# Altium PCB EthereCAT_to_CAN.PcbDoc (part 1 of 3)
Units mil, origin at the board's own origin, x right, y up, seen from the top; angles counter-clockwise.
Board outline 2515.04 x 1574.83 mil, 4 copper layers (Top Layer, L2-G, L3-V, Bottom Layer), stack 23.756 mil thick; 178 components, 102 nets, 583 pads, 389 vias.
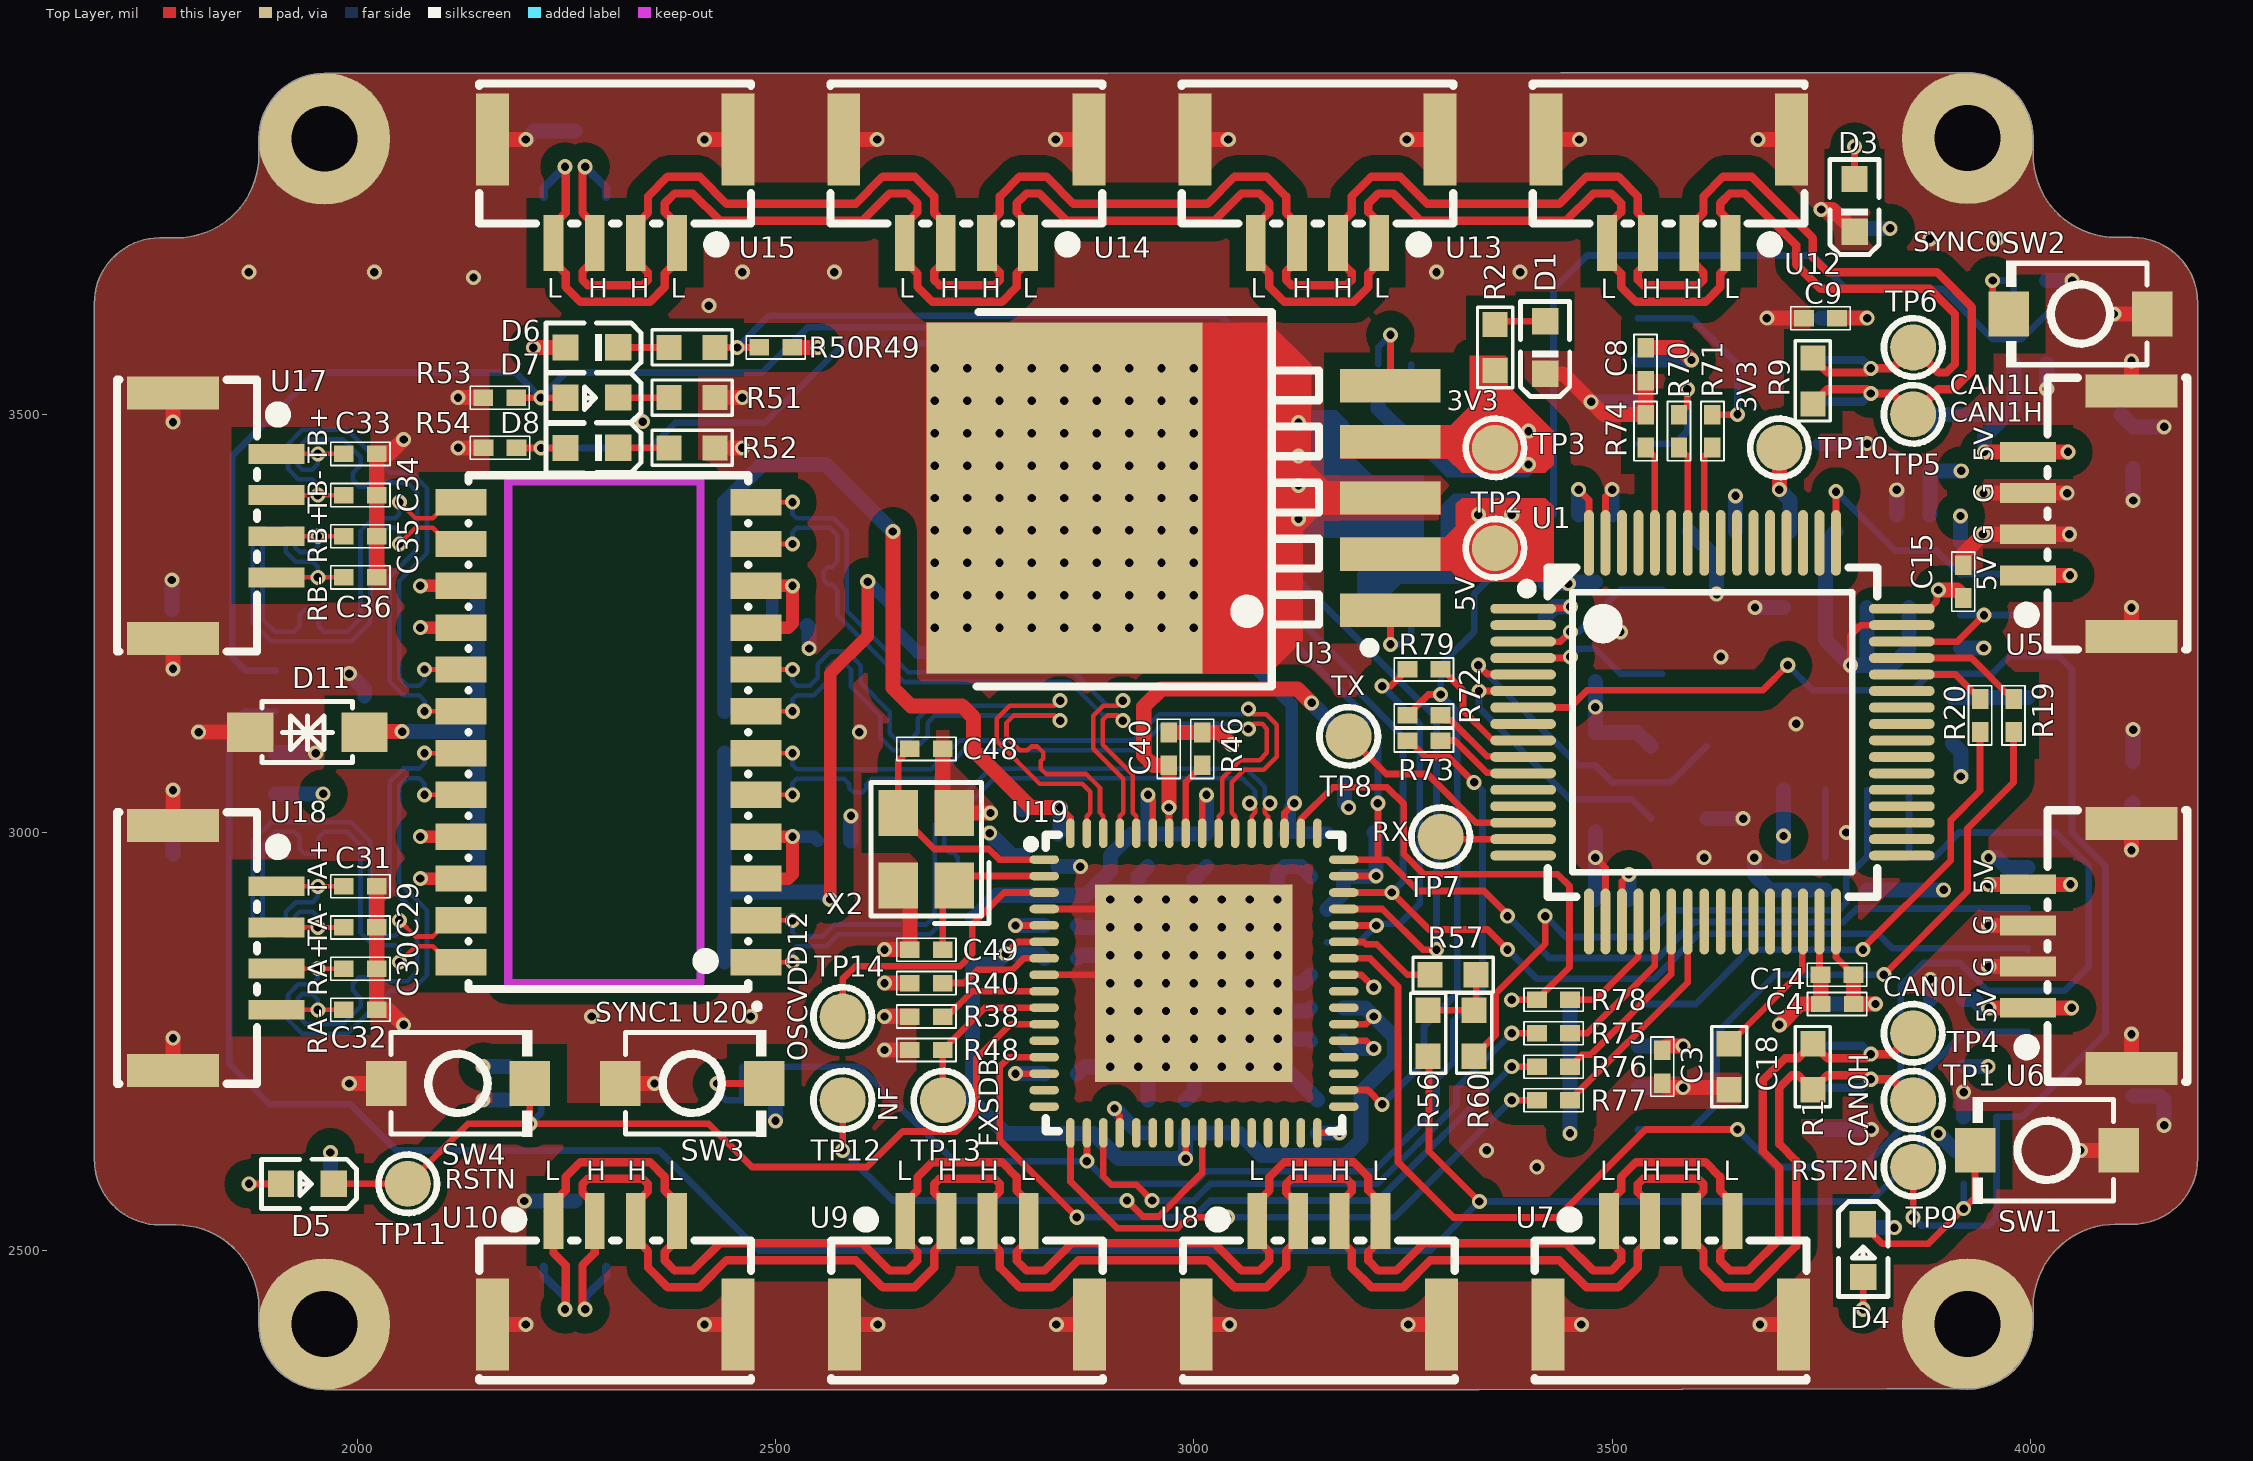
[diagram p0: Top Layer view]
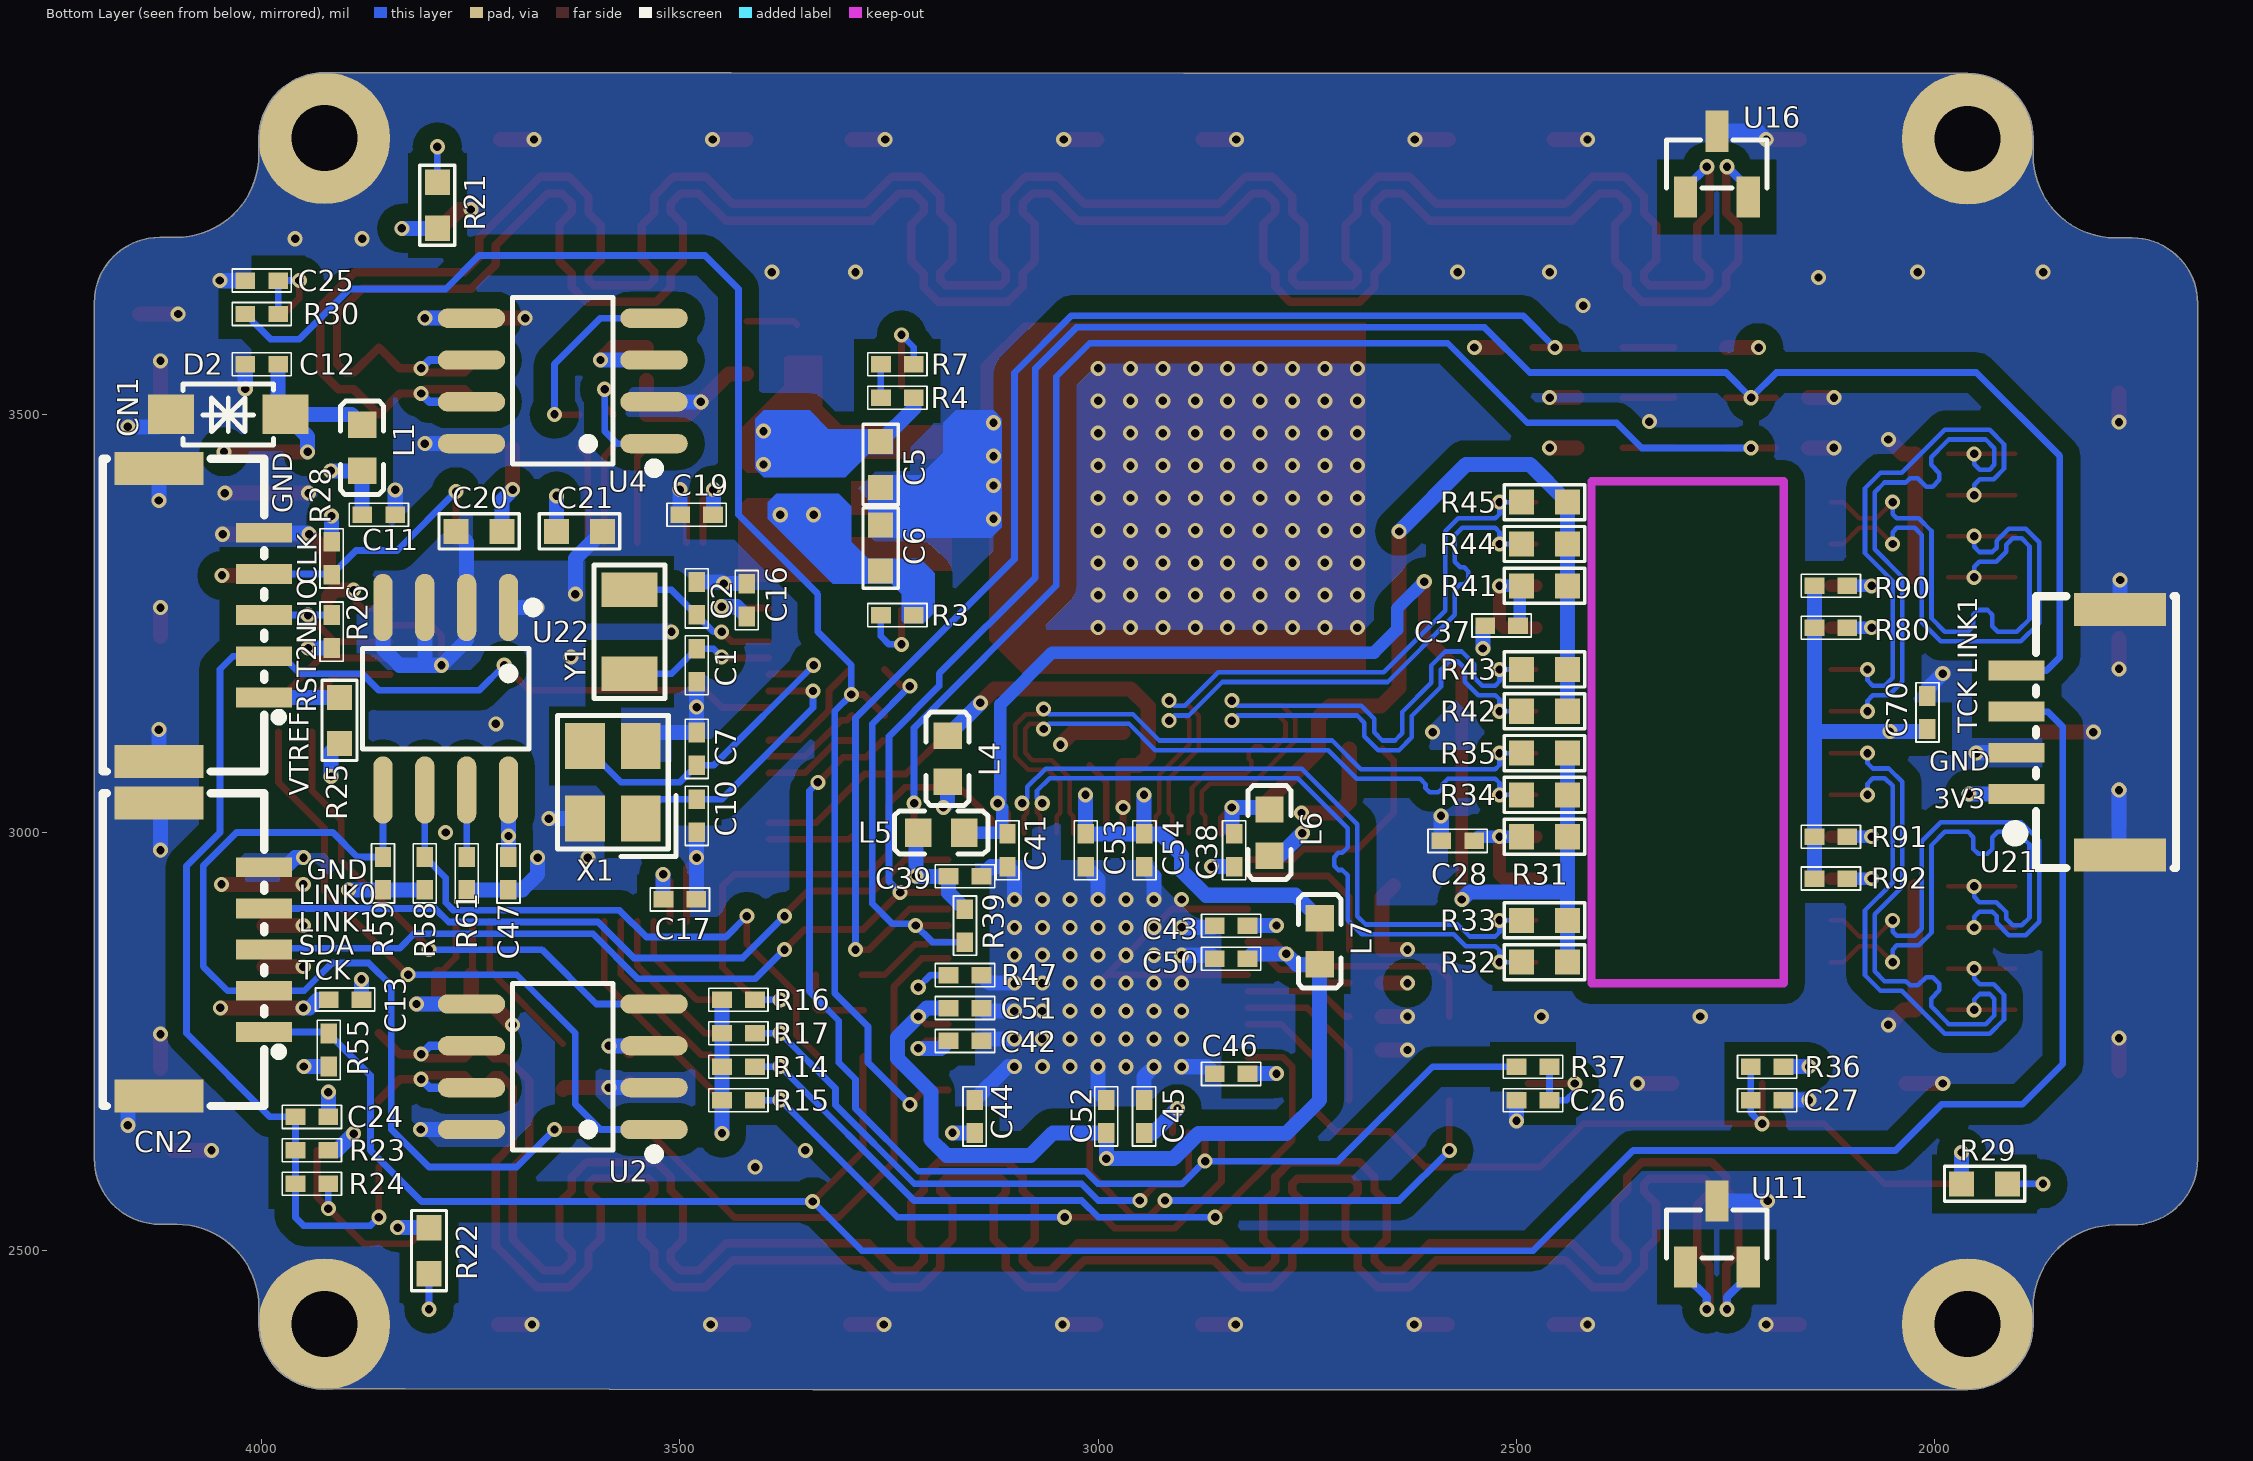
[diagram p1: Bottom Layer view, seen from below]
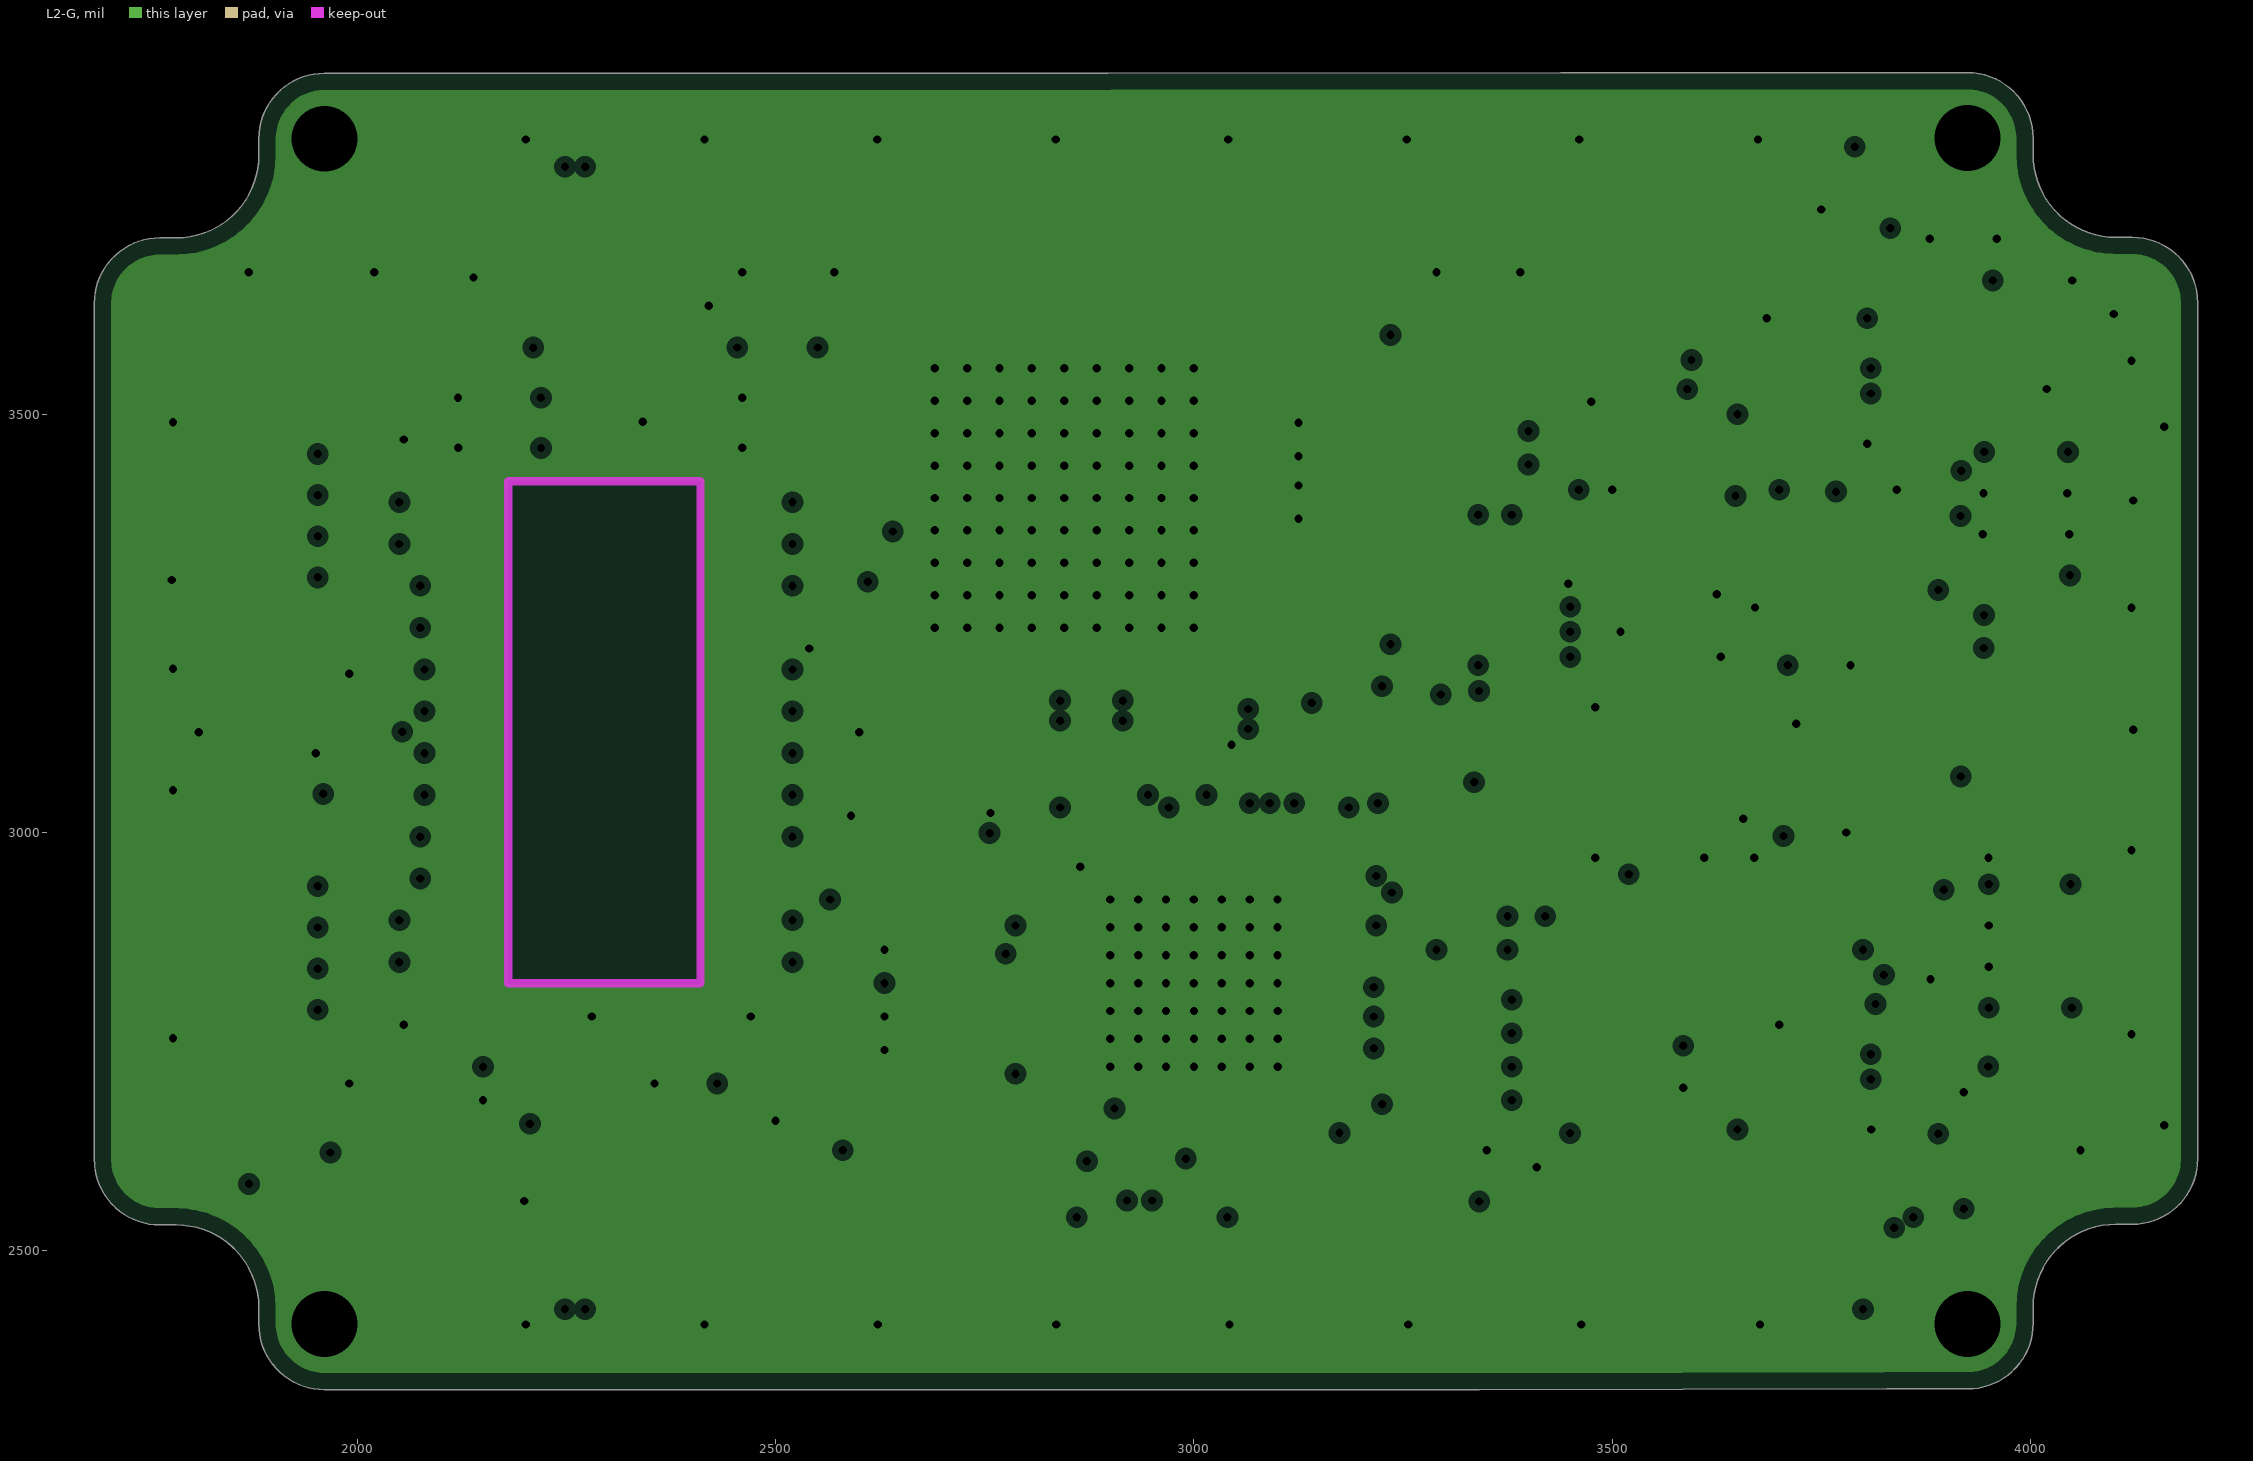
[diagram p2: L2-G, clearances drawn from the general rule]
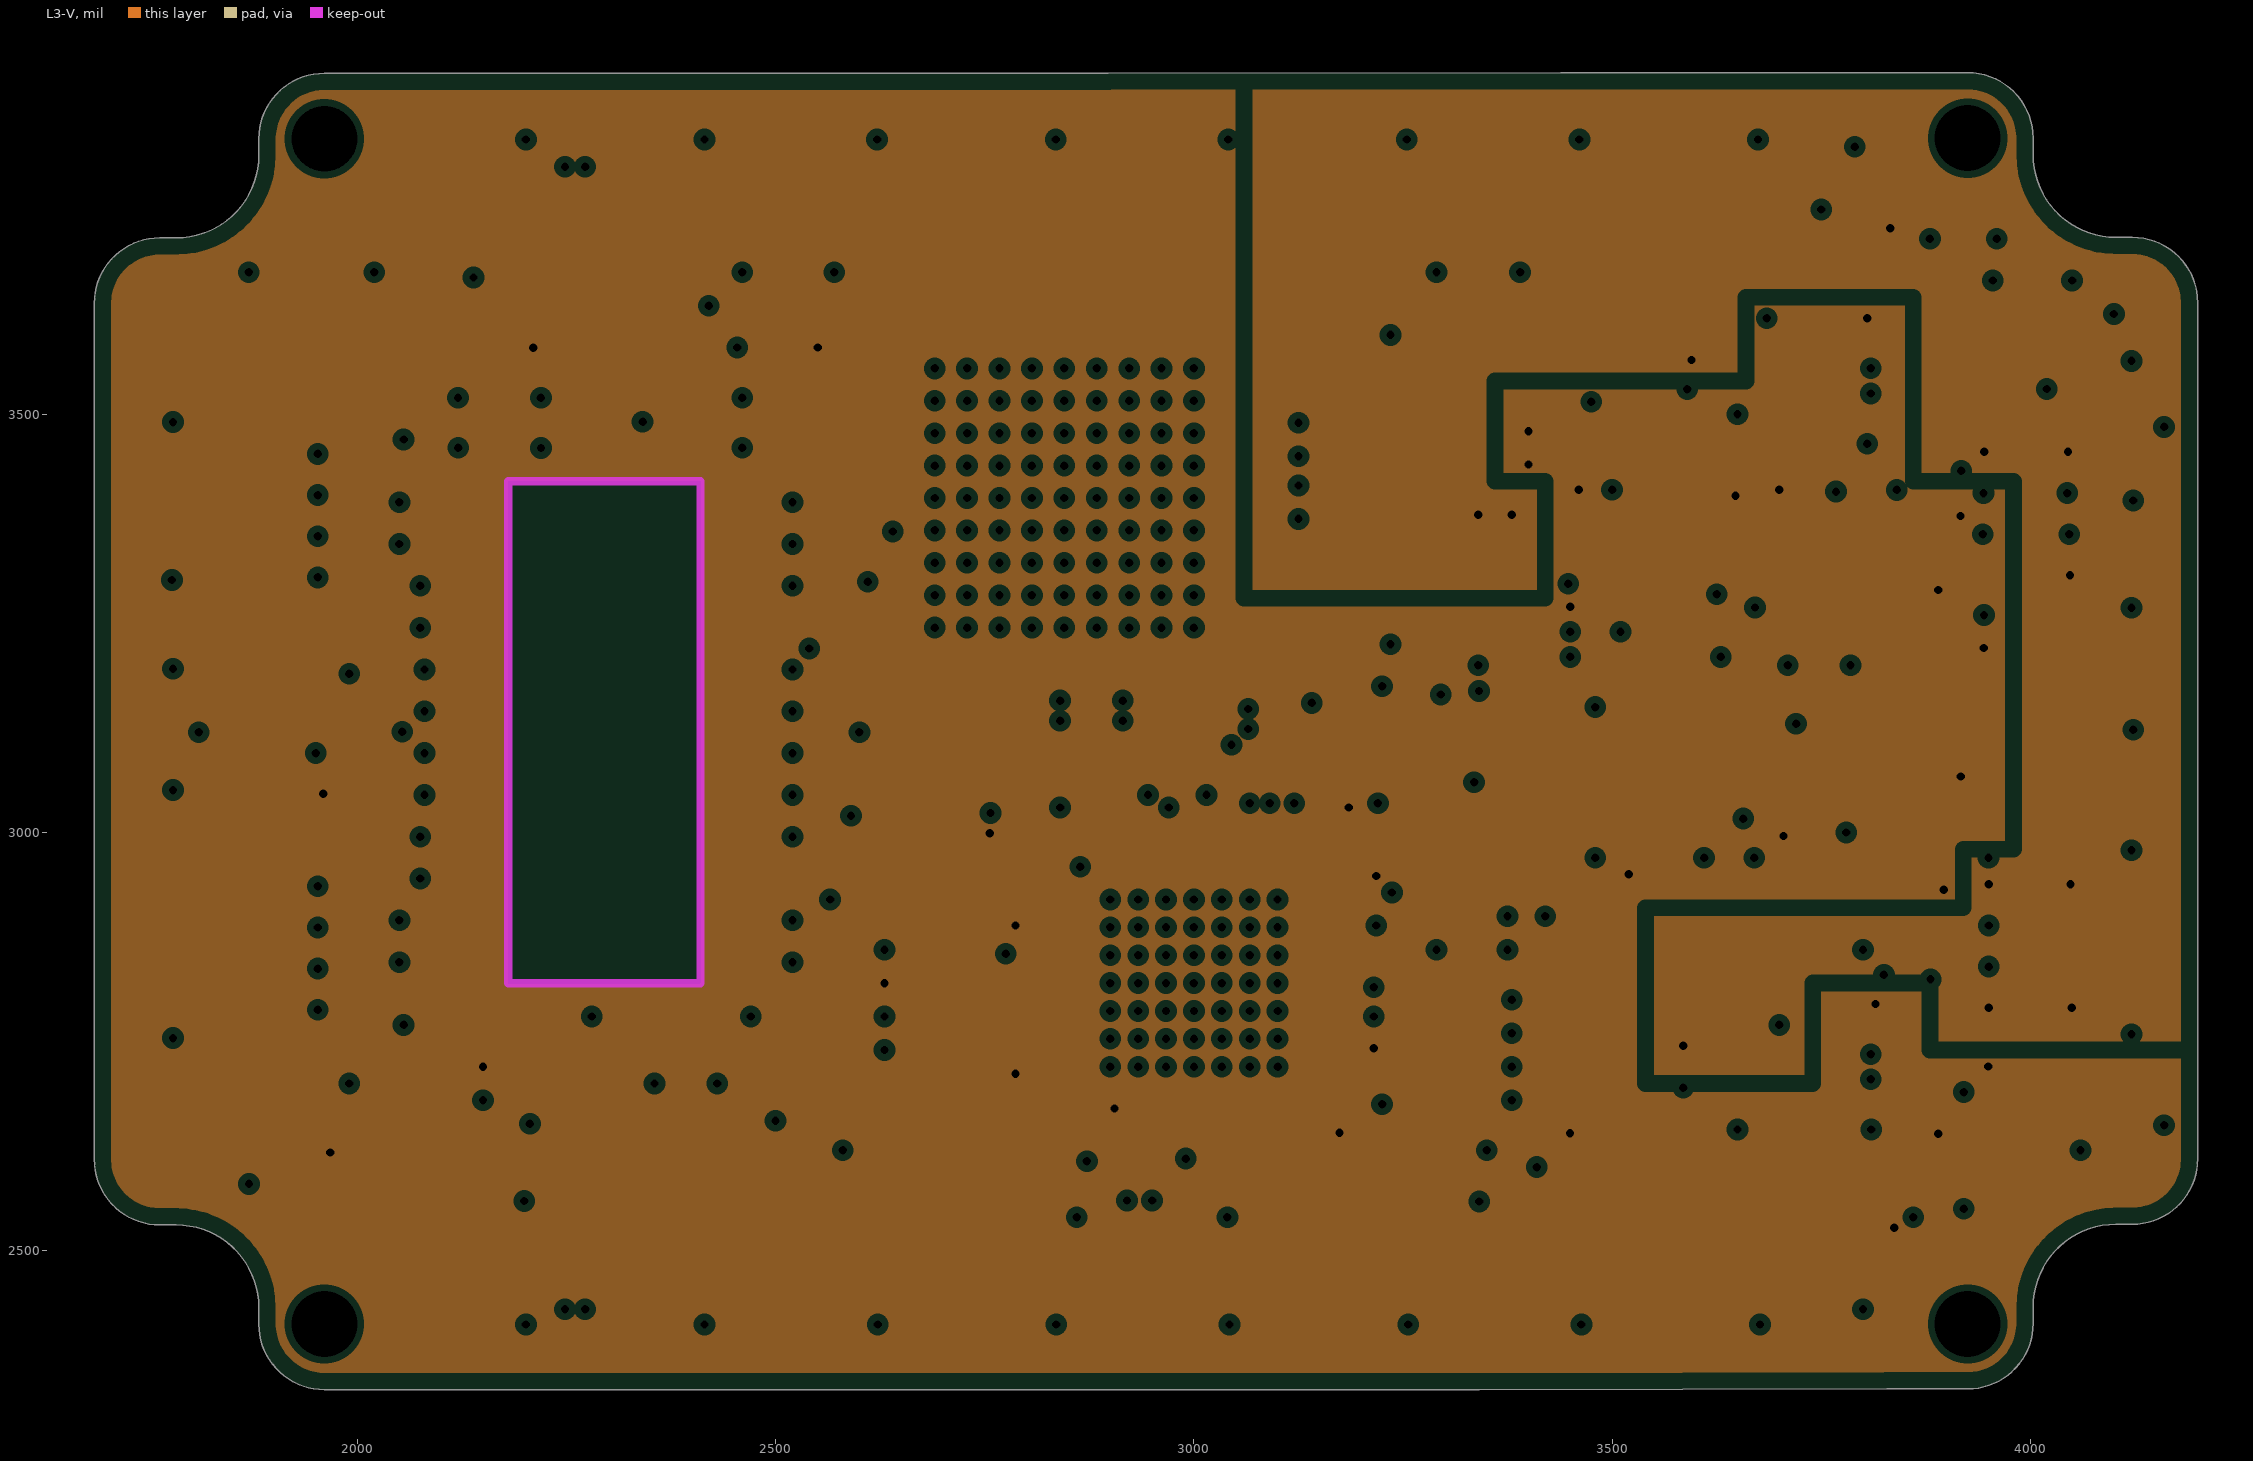
[diagram p3: L3-V, clearances drawn from the general rule]
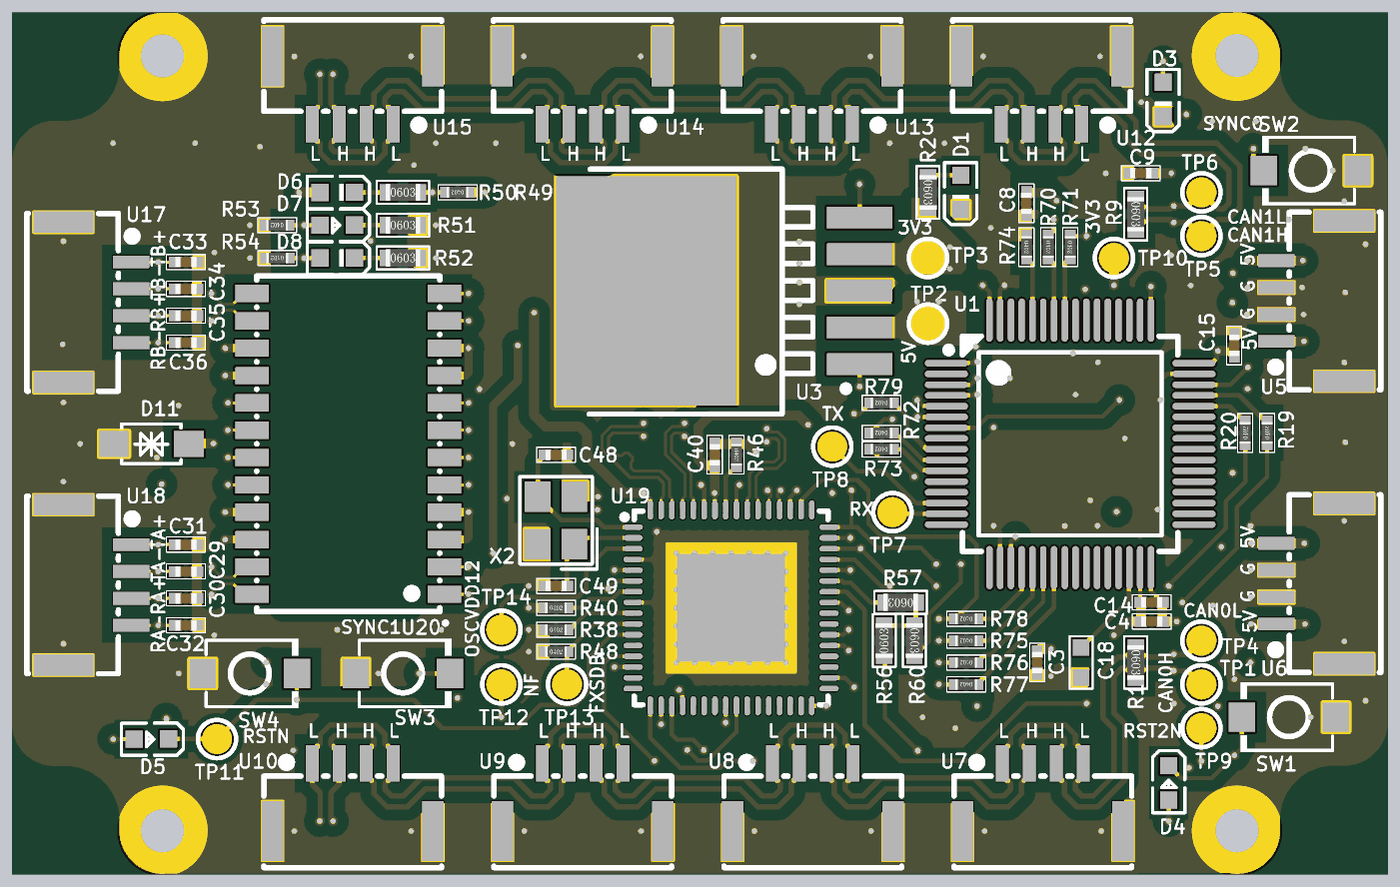
[diagram p5: 3D render of the assembled board from above, using the file's embedded part models]
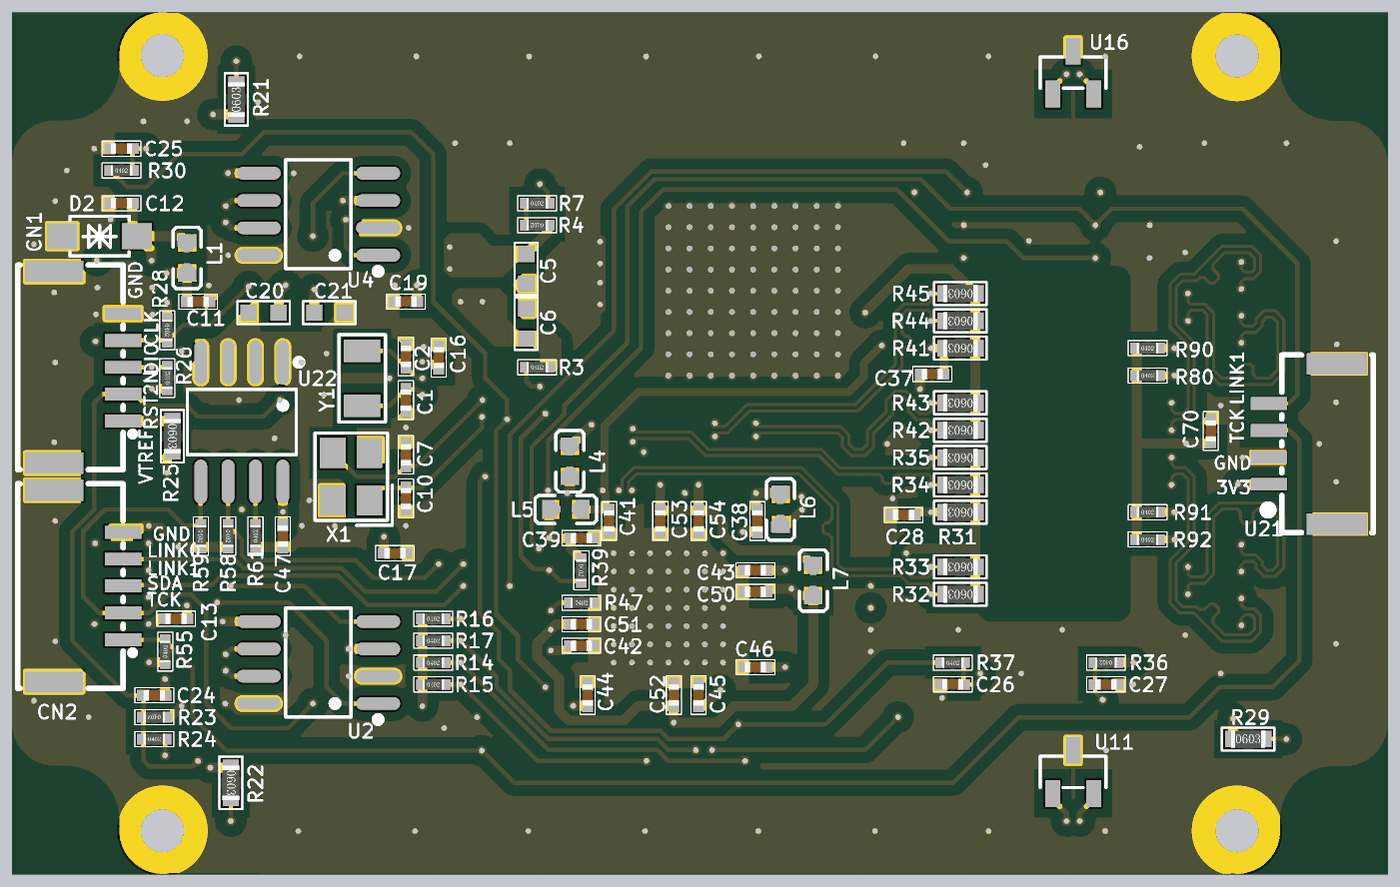
[diagram p6: 3D render of the assembled board from below, using the file's embedded part models]

## Layer stack, top to bottom
Top Solder: solder mask 0.4, Solder Resist, Dk 3.5
Top Layer: signal copper 1.4
Dielectric 2: prepreg 2.8, PP-006, Dk 4.1
L2-G: plane copper 1.378, net GND
Dielectric 1: dielectric 12.6, FR-4, Dk 4.8
L3-V: plane copper 1.378, net 3V3
Dielectric 3: prepreg 2.8, PP-006, Dk 4.1
Bottom Layer: signal copper 1.4
Bottom Solder: solder mask 0.4, Solder Resist, Dk 3.5

## Board outline
1882.02,2412.23 1882.02,2431.92 ccw(c1783.09,2431.92) 1783.09,2530.84 1763.41,2530.84 cw(c1763.41,2609.08) 1685.17,2609.08 1685.17,3632.7 cw(c1763.41,3632.7) 1763.41,3710.94 1783.09,3710.94 ccw(c1783.09,3809.87) 1882.02,3809.87 1882.02,3829.55 cw(c1960.26,3829.55) 1960.26,3907.79 2897.27,3907.79 3438.51,3908.53 3925.12,3908.53 cw(c3925.12,3830.29) 4003.36,3830.29 4003.36,3810.6 ccw(c4102.29,3810.6) 4102.29,3711.68 4121.97,3711.68 cw(c4121.97,3633.44) 4200.21,3633.44 4200.21,2609.82 cw(c4121.97,2609.82) 4121.97,2531.57 4102.29,2531.58 ccw(c4102.29,2432.65) 4003.36,2432.65 4003.36,2412.96 cw(c3925.12,2412.96) 3925.12,2334.72 3828.25,2334.72 3828.27,2334.72 3340.71,2333.7 3340.72,2333.71 2897.72,2333.71 ccw(c2897.27,2333.49) 2897.27,2333.99 1960.26,2333.99 cw(c1960.26,2412.23)

## Design rules (kind name [scope] priority, off if disabled: settings)
AssemblyTestPointUsage [All] p1 off:
AssemblyTestpoint [All] p1 off: testpointundercomponent=TRUE minsize=40 maxsize=100 preferedsize=60 minholesize=0 maxholesize=40 preferedholesize=32 testpointgrid=1 usegrid=TRUE gridtolerance=0.01 allowsidetop=TRUE allowsidebottom=TRUE
Clearance Clearance_4 [InNamedPolygon('1')] p1: gap=20 ignorepadtopadclearanceinfootprint=FALSE
Clearance Clearance_3 [IsKeepOut] p2: gap=1 ignorepadtopadclearanceinfootprint=FALSE except(0: Arc-Hole Track-Hole SMDPad-Hole THPad-Hole Via-Hole Fill-Hole Poly-Hole Region-Hole Text-Hole)
Clearance Clearance_1 [InPolygon] p3: gap=10 ignorepadtopadclearanceinfootprint=FALSE except(0: Arc-Hole Track-Hole SMDPad-Hole THPad-Hole Via-Hole Fill-Hole Poly-Hole Region-Hole Text-Hole)
Clearance Clearance_90 [InDifferentialPairClass('CF90')  or InDifferentialPairClass('CF100')] p4: gap=6 ignorepadtopadclearanceinfootprint=FALSE except(0: Arc-Hole Track-Hole SMDPad-Hole THPad-Hole Via-Hole Fill-Hole Poly-Hole Region-Hole Text-Hole)
Clearance Clearance_2 [HasPad('Free-')] p5: gap=20 ignorepadtopadclearanceinfootprint=FALSE except(0: Arc-Hole Track-Hole SMDPad-Hole THPad-Hole Via-Hole Fill-Hole Poly-Hole Region-Hole Text-Hole)
Clearance [All] p6: gap=6 ignorepadtopadclearanceinfootprint=FALSE except(0: Arc-Hole Track-Hole SMDPad-Hole THPad-Hole Via-Hole Fill-Hole Poly-Hole Region-Hole Text-Hole)
ComponentClearance [All] p1 off: gap=10 collisioncheckmode=3 verticalgap=10 showdistances=FALSE
DiffPairsRouting DiffPairsRouting_120 [InDifferentialPairClass('120')] p1: maxlimit=10 minlimit=10 mostfreqgap=10 toplayer_minwidth=10 toplayer_maxwidth=10 toplayer_prefwidth=10 bottomlayer_minwidth=10 bottomlayer_maxwidth=10 bottomlayer_prefwidth=10 maxuncoupledlength=500
DiffPairsRouting DiffPairsRouting_90 [InDifferentialPairClass('CF90')] p2: maxlimit=6 minlimit=6 mostfreqgap=6 toplayer_minwidth=7 toplayer_maxwidth=7 toplayer_prefwidth=7 bottomlayer_minwidth=7 bottomlayer_maxwidth=7 bottomlayer_prefwidth=7 maxuncoupledlength=5000
DiffPairsRouting [InDifferentialPairClass('CF100')] p3: maxlimit=6 minlimit=6 mostfreqgap=6 toplayer_minwidth=5.5 toplayer_maxwidth=5.5 toplayer_prefwidth=5.5 bottomlayer_minwidth=5.5 bottomlayer_maxwidth=5.5 bottomlayer_prefwidth=5.5 maxuncoupledlength=5000
FabricationTestPointUsage [All] p1 off: valid=0 allowmultiple=FALSE
FabricationTestpoint [All] p1 off: side=3 testpointundercomponent=TRUE minsize=40 maxsize=100 preferedsize=60 minholesize=0 maxholesize=40 preferedholesize=32 testpointgrid=1 allowsidetop=TRUE allowsidebottom=TRUE usegrid=TRUE gridtolerance=0.01
FanoutControl Fanout_BGA [IsBGA] p1 off: bgadir=Out bgaviamode=Centered fanoutstyle=Auto fanoutdirection=Alternating viagrid=1 // Fanout_BGA (Default Rule)
FanoutControl Fanout_LCC [IsLCC] p2 off: bgadir=Out bgaviamode=Centered fanoutstyle=Auto fanoutdirection=Alternating viagrid=1 // Fanout_LCC (Default Rule)
FanoutControl Fanout_SOIC [IsSOIC] p3 off: bgadir=Out bgaviamode=Centered fanoutstyle=Auto fanoutdirection=Alternating viagrid=1 // Fanout_SOIC (Default Rule)
FanoutControl Fanout_Small [(CompPinCount < 5)] p4 off: bgadir=Out bgaviamode=Centered fanoutstyle=Auto fanoutdirection=OutThenIn viagrid=1 // Fanout_Small (Default Rule)
FanoutControl Fanout_Default [All] p5 off: bgadir=Out bgaviamode=Centered fanoutstyle=Auto fanoutdirection=Alternating viagrid=1 // Fanout_Default (Default Rule)
Height [All] p1 off: minheight=0 maxheight=1000 prefheight=500
HoleSize [All] p1: absolutevalues=TRUE maxlimit=200 minlimit=1 maxpercent=80.000 minpercent=20.000
MatchedLengths MatchedLengths_5 [InNetClass('A1')] p1: tolerance=2 checknetsindiffpair=FALSE checkdiffpairvsdiffpair=TRUE checkxsignals=TRUE checkothers=TRUE
MatchedLengths MatchedLengths_4 [InNetClass('A2')] p2: tolerance=2 checknetsindiffpair=FALSE checkdiffpairvsdiffpair=TRUE checkxsignals=TRUE checkothers=TRUE
MatchedLengths MatchedLengths_3 [InNetClass('B1')] p3: tolerance=2 checknetsindiffpair=FALSE checkdiffpairvsdiffpair=TRUE checkxsignals=TRUE checkothers=TRUE
MatchedLengths MatchedLengths_2 [InNetClass('B2')] p4: tolerance=2 checknetsindiffpair=FALSE checkdiffpairvsdiffpair=TRUE checkxsignals=TRUE checkothers=TRUE
MatchedLengths MatchedLengths_1 [InxSignalClass('mipi-rx')] p5: tolerance=5 checknetsindiffpair=FALSE checkdiffpairvsdiffpair=TRUE checkxsignals=TRUE checkothers=TRUE
MatchedLengths [InDifferentialPairClass('All Differential Pairs')] p6 off: tolerance=1 checknetsindiffpair=TRUE checkdiffpairvsdiffpair=FALSE checkxsignals=FALSE checkothers=FALSE
MinimumSolderMaskSliver [All] p1: minsoldermaskwidth=0.1
NetAntennae [All] p1 off: netantennaetolerance=0
PlaneClearance [All] p1: clearance=8
PlaneConnect PlaneConnect_1 [IsVia] p1: planeconnectstyle=Direct reliefexpansion=20 reliefentries=4 reliefconductorwidth=10 reliefairgap=10
PlaneConnect [All] p2: planeconnectstyle=Relief reliefexpansion=20 reliefentries=4 reliefconductorwidth=20 reliefairgap=10
PolygonConnect PolygonConnect_1 [IsVia] p1: connectstyle=Direct reliefconductorwidth=10 reliefentries=4 polygonreliefangle="90 Angle" airgapwidth=10
PolygonConnect [All] p2: connectstyle=Direct reliefconductorwidth=15 reliefentries=4 polygonreliefangle="90 Angle" airgapwidth=10
RoutingVias [All] p1: holewidth=10 width=18 viastyle="Through Hole" minholewidth=10 minwidth=18 maxholewidth=20 maxwidth=40
SilkToSilkClearance [All] p1 off: silktosilkclearance=10
SilkToSolderMaskClearance SilkscreenOverComponentPads [IsPad] p1 off: minsilkscreentomaskgap=0.1 clearancetoexposedcopper=TRUE
SolderMaskExpansion SolderMaskExpansion_1 [isvia] p1: expansion=4 istentingtop=TRUE
SolderMaskExpansion [All] p2: expansion=4 istentingtop=FALSE
Width Width_vcc [InNetClass('VCC')] p1: maxlimit=40 minlimit=8 preferedwidth=18
Width Width_90 [InDifferentialPairClass('CF90')] p2: maxlimit=7 minlimit=7 preferedwidth=7
Width Width_cf100 [(InDifferentialPairClass('cf100'))] p3: maxlimit=5.5 minlimit=5.5 preferedwidth=5.5
Width [All] p4: maxlimit=32 minlimit=8 preferedwidth=8 minimp=50.000000 maximp=50.000000 favimp=50.000000
11 further rules are at their usual default settings.

## Classes and differential pairs
net class B2: RXB_N RXB_P TXB_N TXB_P
net class A2: RXA_N RXA_P TXA_N TXA_P
net class B1: RXB+ RXB- TXB+ TXB-
net class A1: RXA+ RXA- TXA+ TXA-
net class vcc: 3V3 5V GND VBUS VDD12F VDD33B VDD33TXF1 VDD33TXF2 VDDCR VTREF
differential pair class CF100: RXA RXA_ RXB RXB_ TXA TXA_ TXB TXB_
differential pair class 120: CAN0 CAN1
net class CF: CAN0_H CAN0_L CAN1_H CAN1_L RXA+ RXA- RXA_N RXA_P RXB+ RXB- RXB_N RXB_P TXA+ TXA- TXA_N TXA_P TXB+ TXB- TXB_N TXB_P
net class GBE: RXA_N RXA_P RXB_N RXB_P TXA_N TXA_P TXB_N TXB_P
differential pair RXA_: +RXA_P -RXA_N
differential pair RXB_: +RXB_P -RXB_N
differential pair TXA_: +TXA_P -TXA_N
differential pair TXB_: +TXB_P -TXB_N
differential pair CAN0: +CAN0_H -CAN0_L
differential pair CAN1: +CAN1_H -CAN1_L
differential pair USB0: +"" -""
differential pair TXB: +TXB+ -TXB-
differential pair TXA: +TXA+ -TXA-
differential pair RXB: +RXB+ -RXB-
differential pair RXA: +RXA+ -RXA-

## Components (designator, comment, footprint, x,y, rotation, side; value= is the part's Value field where it differs from the comment)
C1 "0402/10pF/50V" C0402 3480,3200 r90 bottom
C2 "0402/10pF/50V" C0402 3480,3280 r270 bottom
C3 "0402/0.1uF/50V" C0402 3560,2720 r90 top
C4 "0402/0.1uF/50V" C0402 3769.15,2795 r0 top
C5 "10uF/0603/10V" C0603 3260,3440 r90 bottom
C6 "10uF/0603/10V" C0603 3260,3340 r270 bottom
C7 "0402/10pF/50V" C0402 3480,3100 r270 bottom
C8 "0402/0.1uF/50V" C0402 3540,3560 r90 top
C9 "0402/0.1uF/50V" C0402 3749.15,3615 r0 top
C10 "0402/10pF/50V" C0402 3480,3020 r270 bottom
C11 "0402/1uF/50V" C0402 3860,3380 r0 bottom
C12 "0402/0.1uF/50V" C0402 4000,3560 r180 bottom
C13 "0402/0.1uF/50V" C0402 3900.31,2800.32 r0 bottom
C14 "0402/0.1uF/50V" C0402 3768.9,2830 r0 top
C15 "0402/0.1uF/50V" C0402 3920,3300 r270 top
C16 "0402/0.1uF/50V" C0402 3420,3277.87 r270 bottom
C17 "0402/0.1uF/50V" C0402 3500,2920 r0 bottom
C18 "4.7uF/0603/10V" C0603 3640,2720 r90 top
C19 "0402/0.1uF/50V" C0402 3480,3380 r180 bottom
C20 "10uF/0603/10V" C0603 3740,3360 r180 bottom
C21 "10uF/0603/10V" C0603 3620,3360 r0 bottom
C24 "0402/0.1uF/50V" C0402 3940,2660 r0 bottom
C25 "0402/0.1uF/50V" C0402 4000,3660 r180 bottom
C26 "0402/0.1uF/50V" C0402 2480,2680 r180 bottom
C27 "0402/0.1uF/50V" C0402 2200,2680 r0 bottom
C28 "0402/0.1uF/50V" C0402 2570,2990 r180 bottom
C29 "0402/10pF/50V" C0402 2003.24,2886.5 r180 top
C30 "0402/10pF/50V" C0402 2003.24,2837.29 r180 top
C31 "0402/10pF/50V" C0402 2003.24,2935.71 r180 top
C32 "0402/10pF/50V" C0402 2003.24,2788.07 r180 top
C33 "0402/10pF/50V" C0402 2003.24,3452.71 r180 top
C34 "0402/10pF/50V" C0402 2003.24,3403.5 r180 top
C35 "0402/10pF/50V" C0402 2003.24,3354.29 r180 top
C36 "0402/10pF/50V" C0402 2003.24,3305.07 r180 top
C37 "0402/0.1uF/50V" C0402 2517.5,3247.5 r180 bottom
C38 "0402/0.1uF/50V" C0402 2837.37,2978.82 r90 bottom
C39 "0402/0.1uF/50V" C0402 3159.13,2947.64 r0 bottom
C40 "0402/0.1uF/50V" C0402 2970,3100 r270 top
C41 "0402/0.1uF/50V" C0402 3108.28,2978.82 r90 bottom
C42 "0402/0.1uF/50V" C0402 3159.13,2750.79 r0 bottom
C43 "0402/0.1uF/50V" C0402 2840.87,2888.59 r180 bottom
C44 "0402/0.1uF/50V" C0402 3147.65,2660.55 r270 bottom
C45 "0402/0.1uF/50V" C0402 2945,2660.55 r270 bottom
C46 "0402/0.1uF/50V" C0402 2840.87,2711.42 r180 bottom
C47 "0402/0.1uF/50V" C0402 3705,2951.16 r90 bottom
C48 "0402/10pF/50V" C0402 2680,3100 r180 top
C49 "0402/10pF/50V" C0402 2680,2860 r0 top
C50 "0402/0.1uF/50V" C0402 2840.87,2849.22 r180 bottom
C51 "0402/0.1uF/50V" C0402 3159.13,2790.16 r0 bottom
C52 "0402/1uF/50V" C0402 2990.17,2660.55 r270 bottom
C53 "0402/0.1uF/50V" C0402 3014.85,2978.82 r90 bottom
C54 "0402/0.1uF/50V" C0402 2944.61,2978.82 r90 bottom
C70 "0402/0.1uF/50V" C0402 2008.31,3143.62 r270 bottom
CN1 "A1257WR-S-5P" CONN-SMD_A1257WR-S-5P 4060,3260 r270 bottom
CN2 "A1257WR-S-5P" CONN-SMD_A1257WR-S-5P 4060,2860 r270 bottom
D1 "XL-1608PGC-06" LED0603-RD_GREEN 3420,3580 r90 top
D2 "SMF6.5CA" SOD-123FL_L2.7-W1.8-LS3.8-BI 4040,3500 r180 bottom
D3 "XL-1608PGC-06" LED0603-RD_GREEN 3790,3750 r90 top
D4 "XL-1608SURC-06" LED0603-RD_RED 3800,2500 r270 top
D5 "XL-1608SURC-06" LED0603-RD_RED 1940,2580 r180 top
D6 "XL-1608PGC-06" LED0603-RD_GREEN 2280,3580 r180 top
D7 "XL-1608SURC-06" LED0603-RD_RED 2280,3520 r180 top
D8 "XL-1608PGC-06" LED0603-RD_GREEN 2280,3460 r180 top
D11 "SMF618CA" SOD-123FL_L2.7-W1.8-LS3.8-BI 1940,3120 r0 top
L1 "GZ1608D601TF" L0603 3880,3460 r90 bottom
L4 "GZ1608D601TF" L0603 3180,3088.19 r90 bottom
L5 "GZ1608D601TF" L0603 3187.55,3000 r180 bottom
L6 "GZ1608D601TF" L0603 2795,3000 r90 bottom
L7 "GZ1608D601TF" L0603 2735,2870 r90 bottom
R1 "0603/120R/1%" R0603 3740,2720 r270 top
R2 "0603/2k/5%" R0603 3360,3580 r270 top
R3 "0402/10k/5%" R0402 3240,3260 r180 bottom
R4 "0402/84.5k/5%" R0402 3240,3520 r0 bottom
R7 "0402/10k/5%" R0402 3240,3560 r180 bottom
R9 "0603/120R/1%" R0603 3740,3540 r270 top
R14 "0402/10k/5%" R0402 3430,2720 r180 bottom
R15 "0402/10k/5%" R0402 3430,2680 r180 bottom
R16 "0402/10k/5%" R0402 3430,2800 r180 bottom
R17 "0402/10k/5%" R0402 3430,2760 r180 bottom
R19 "0402/0R/1%" R0402 3980,3140 r90 top
R20 "0402/0R/1%" R0402 3940,3140 r90 top
R21 "0603/2.2K/5%" R0603 3790,3750 r90 bottom
R22 "0603/2.2K/5%" R0603 3800,2500 r270 bottom
R23 "0402/10k/5%" R0402 3940,2620 r0 bottom
R24 "0402/10k/5%" R0402 3940,2580 r180 bottom
R25 "0603/0R/1%" R0603 3907.01,3134.1 r270 bottom
R26 "0402/1k/5%" R0402 3916.49,3240.31 r90 bottom
R28 "0402/1k/5%" R0402 3916.49,3327.87 r270 bottom
R29 "0603/2.2K/5%" R0603 1940,2580 r180 bottom
R30 "0402/10k/5%" R0402 4000,3620 r180 bottom
R31 "0603/0R/1%" R0603 2466.18,2995 r0 bottom
R32 "0603/49.9R/1%" R0603 2466.18,2845 r0 bottom
R33 "0603/49.9R/1%" R0603 2466.18,2895 r0 bottom
R34 "0603/49.9R/1%" R0603 2466.18,3045 r0 bottom
R35 "0603/49.9R/1%" R0603 2466.18,3095 r0 bottom
R36 "0402/10k/5%" R0402 2200,2720 r0 bottom
R37 "0402/10k/5%" R0402 2480,2720 r180 bottom
R38 "0402/2.2K/1%" R0402 2680,2780 r0 top
R39 "0402/10k/5%" R0402 3159.13,2888.59 r270 bottom
R40 "0402/12.1k/5%" R0402 2680,2820 r0 top
R41 "0603/0R/1%" R0603 2466.18,3295 r0 bottom
R42 "0603/49.9R/1%" R0603 2466.18,3145 r0 bottom
R43 "0603/49.9R/1%" R0603 2466.18,3195 r0 bottom
R44 "0603/49.9R/1%" R0603 2466.18,3345 r0 bottom
R45 "0603/49.9R/1%" R0603 2466.18,3395 r0 bottom
R46 "0402/12.1k/5%" R0402 3010,3100 r270 top
R47 "0402/10k/5%" R0402 3159.13,2829.53 r180 bottom
R48 "0402/2.2K/1%" R0402 2680,2740 r0 top
R49 "0402/10k/5%" R0402 2500,3580 r180 top
R50 "0603/2.2K/5%" R0603 2400,3580 r0 top
R51 "0603/2.2K/5%" R0603 2400,3520 r0 top
R52 "0603/2.2K/5%" R0603 2400,3460 r0 top
R53 "0402/10k/5%" R0402 2170,3520 r180 top
R54 "0402/10k/5%" R0402 2170.31,3460 r180 top
R55 "0402/10k/5%" R0402 3920,2740 r90 bottom
R56 "0603/0R/1%" R0603 3280,2760 r90 top
R57 "0603/0R/1%" R0603 3310,2830 r180 top
R58 "0402/2.2k/5%" R0402 3805,2951.16 r270 bottom
R59 "0402/2.2k/5%" R0402 3855,2951.16 r270 bottom
R60 "0603/0R/1%" R0603 3335,2760 r270 top
R61 "0402/2.2k/5%" R0402 3755,2951.16 r90 bottom
R70 "0402/0R/1%" R0402 3580,3480 r270 top
R71 "0402/0R/1%" R0402 3620,3480 r270 top
R72 "0402/10k/5%" R0402 3275,3140 r180 top
R73 "0402/10k/5%" R0402 3275,3110 r180 top
R74 "0402/0R/1%" R0402 3540,3480 r270 top
R75 "0402/0R/1%" R0402 3430,2760 r180 top
R76 "0402/0R/1%" R0402 3430,2720 r180 top
R77 "0402/0R/1%" R0402 3430,2680 r180 top
R78 "0402/0R/1%" R0402 3430,2800 r180 top
R79 "0402/10K/5%" R0402 3275,3195 r180 top
R80 "0402/75R/1%" R0402 2123.82,3245 r180 bottom
R90 "0402/75R/1%" R0402 2123.82,3295 r180 bottom
R91 "0402/75R/1%" R0402 2123.82,2995 r180 bottom
R92 "0402/75R/1%" R0402 2123.82,2945 r180 bottom
SW1 "TS-1088R-02026" SW-SMD_L3.9-W3.0-P4.45 4020,2620 r180 top
SW2 "TS-1088R-02026" SW-SMD_L3.9-W3.0-P4.45 4060,3620 r180 top
SW3 "TS-1088R-02026" SW-SMD_L3.9-W3.0-P4.45 2400,2700 r0 top
SW4 "TS-1088R-02026" SW-SMD_L3.9-W3.0-P4.45 2120,2700 r0 top
TP1 "Test Point" TEST_1.2 3860,2680 r180 top
TP2 "Test Point" TEST_1.2 3360,3340 r180 top
TP3 "Test Point" TEST_1.2 3360,3460 r180 top value=Red
TP4 "Test Point" TEST_1.2 3860,2760 r270 top
TP5 "Test Point" TEST_1.2 3860,3500 r180 top
TP6 "Test Point" TEST_1.2 3860,3580 r270 top
TP7 "Test Point" TEST_1.2 3295,2995 r180 top
TP8 "Test Point" TEST_1.2 3185,3115 r180 top
TP9 "Test Point" TEST_1.2 3860,2600 r0 top
TP10 "Test Point" TEST_1.2 3700,3460 r0 top
TP11 "Test Point" TEST_1.2 2060,2580 r0 top
TP12 "Test Point" TEST_1.2 2580,2680 r90 top value=White
TP13 "Test Point" TEST_1.2 2700,2680 r0 top value=White
TP14 "Test Point" TEST_1.2 2580,2780 r0 top value=Red
U1 "STM32F446RET6" LQFP-64_L10.0-W10.0-P0.50-LS12.0-BL 3620,3120 r270 top
U2 "ATA6561-GAQW" SOIC-8_L4.9-W3.9-P1.27-LS6.0-BL 3640,2720 r90 bottom
U3 "MCP1825-ADJE/ET" D2PAK-5_L9.2-W10.0-P1.70-LS14.2-BR 3040,3400 r0 top
U4 "ATA6561-GAQW" SOIC-8_L4.9-W3.9-P1.27-LS6.0-BL 3640,3540 r90 bottom
U5 "WAFER-GH1.25-4PWB" CONN-SMD_4P-P1.25_XUNPU_WAFER-GH1.25-4PWB 4059.09,3381.29 r90 top
U6 "WAFER-GH1.25-4PWB" CONN-SMD_4P-P1.25_XUNPU_WAFER-GH1.25-4PWB 4059.09,2864.29 r90 top
U7 "WAFER-GH1.25-4PWB" CONN-SMD_4P-P1.25_XUNPU_WAFER-GH1.25-4PWB 3570.06,2473.77 r0 top
U8 "WAFER-GH1.25-4PWB" CONN-SMD_4P-P1.25_XUNPU_WAFER-GH1.25-4PWB 3149.39,2473.77 r0 top
U9 "WAFER-GH1.25-4PWB" CONN-SMD_4P-P1.25_XUNPU_WAFER-GH1.25-4PWB 2728.73,2473.77 r0 top
U10 "WAFER-GH1.25-4PWB" CONN-SMD_4P-P1.25_XUNPU_WAFER-GH1.25-4PWB 2308.06,2473.77 r0 top
U11 "ESD2CAN24DBZRQ1" SOT-23-3_L2.9-W1.3-P1.90-LS2.4-BR 2260,2520 r270 bottom
U12 "WAFER-GH1.25-4PWB" CONN-SMD_4P-P1.25_XUNPU_WAFER-GH1.25-4PWB 3567.66,3766.72 r180 top
U13 "WAFER-GH1.25-4PWB" CONN-SMD_4P-P1.25_XUNPU_WAFER-GH1.25-4PWB 3147.79,3766.72 r180 top
U14 "WAFER-GH1.25-4PWB" CONN-SMD_4P-P1.25_XUNPU_WAFER-GH1.25-4PWB 2727.93,3766.72 r180 top
U15 "WAFER-GH1.25-4PWB" CONN-SMD_4P-P1.25_XUNPU_WAFER-GH1.25-4PWB 2308.06,3766.72 r180 top
U16 "ESD2CAN24DBZRQ1" SOT-23-3_L2.9-W1.3-P1.90-LS2.4-BR 2260.01,3799.22 r270 bottom
U17 "WAFER-GH1.25-4PWB" CONN-SMD_4P-P1.25_XUNPU_WAFER-GH1.25-4PWB 1841.23,3378.89 r270 top
U18 "WAFER-GH1.25-4PWB" CONN-SMD_4P-P1.25_XUNPU_WAFER-GH1.25-4PWB 1841.23,2861.89 r270 top
U19 "LAN9252 QFN-64" QFN-64_L9.0-W9.0-P0.50-BL-EP6.0 3000,2820 r270 top locked value=LAN9253
U20 "G2426S" XFMR-SMD_24P-L15.6-W8.5-P1.27-LS9.5-BL 2300,3120 r90 top
U21 "WAFER-GH1.25-4PWB" CONN-SMD_4P-P1.25_XUNPU_WAFER-GH1.25-4PWB 1840,3120 r90 bottom
U22 "AT24C128C-SSHM-T" SOIC-8_L4.9-W3.9-P1.27-LS6.0-BL 3780,3160 r0 bottom
X1 "X32258MSB4SI" CRYSTAL-SMD_4P-L3.2-W2.5-BL 3580,3060 r90 bottom value=8MHz
X2 "XL2EL89CSI-111YLC-25M" CRYSTAL-SMD_4P-L3.2-W2.5-BL 2680,2980 r90 top value=25MHz
Y1 "XKXGI-SUA-32.768K" CRYSTAL-SMD_L3.2-W1.5-1 3560,3240 r90 bottom value=32.768kHz

## Footprints (in the part's own frame and the unit in brackets; to place one, negate y for a bottom-side part, rotate by r counter-clockwise, add the part's x,y. Pads: shape width x height; smd on the part's side, far side on the other; paste and mask are expansions set on the pad)
C0402 [mm] "Chip Capacitor, Body 1.0x0.5mm, IPC High Density"
  rect 0.6x0.5 smd: 1(-0.5,0) 2(0.5,0)
  silkscreen extent -0.9,-0.35 0.9,0.35, body extent -0.5,-0.25 0.5,0.25, height 0.48
C0603 [mil] "Capacitor"
  rect 30x30 smd: 1(-27.5,0) 2(27.5,0)
  silkscreen extent -48,-21 48,21, body extent -35,-15 35,15, height 33
CONN-SMD_4P-P1.25_XUNPU_WAFER-GH1.25-4PWB [mm]
  rect 0.6x1.7 smd paste+0 mask+0.05: 1(-1.875,1.575) 2(-0.625,1.575) 3(0.625,1.575) 4(1.875,1.575)
  rect 1x2.8 smd paste+0 mask+0.05: 5(3.725,-1.575) 6(-3.725,-1.575)
  silkscreen extent -4.13,-3.27 4.12,1.81
CONN-SMD_A1257WR-S-5P [mm]
  rect 0.6x1.7 smd: 1(2.499,1.6) 2(1.25,1.6) 3(0,1.6) 4(-1.25,1.6) 5(-2.499,1.6)
  rect 1x2.7 smd: 6(4.45,-1.6) 7(-4.45,-1.6)
  silkscreen extent -4.75,-3.3 4.75,2.17
CRYSTAL-SMD_4P-L3.2-W2.5-BL [mm]
  rect 1.4x1.2 smd: 1(-1.1,-0.85) 2(1.1,-0.85) 3(1.1,0.85) 4(-1.1,0.85)
  silkscreen extent -2.26,-1.91 2.03,1.68
CRYSTAL-SMD_L3.2-W1.5-1 [mm]
  rect 1.05x1.7 smd: 1(-1.275,0) 2(1.275,0)
  silkscreen extent -2.03,-1.08 2.03,1.08
D2PAK-5_L9.2-W10.0-P1.70-LS14.2-BR [mil]
  rect 120.08x40 smd: 1(194.98,-134) 2(194.98,-67) 3(194.98,0) 4(194.98,67) 5(194.98,134)
  rect 329.92x419.69 smd: PAD(-194.98,0)
  silkscreen extent -300,-225 176,222
L0603 [mm]
  rect 0.8x0.864 smd paste-100 mask+0.051: 1(-0.7,0) 2(0.7,0)
  silkscreen extent -1.42,-0.65 1.42,0.65
LED0603-RD_GREEN [mm]
  rect 0.8x0.8 smd: 1(-0.799,-0.003) 2(0.799,0.003)
  silkscreen extent -1.49,-0.75 1.39,0.76
LED0603-RD_RED [mm]
  rect 0.8x0.8 smd: 1(-0.8,-0.003) 2(0.8,0.003)
  silkscreen extent -1.49,-0.75 1.39,0.76
LQFP-64_L10.0-W10.0-P0.50-LS12.0-BL [mm]
  oval 0.3x2 smd: 1(-3.75,-5.75) 2(-3.25,-5.75) 3(-2.75,-5.75) 4(-2.25,-5.75) 5(-1.75,-5.75) 6(-1.25,-5.75) 7(-0.75,-5.75) 8(-0.25,-5.75) 9(0.25,-5.75) 10(0.75,-5.75) 11(1.25,-5.75) 12(1.75,-5.75) 13(2.25,-5.75) 14(2.75,-5.75) 15(3.25,-5.75) 16(3.75,-5.75) 33(3.75,5.75) 34(3.25,5.75) 35(2.75,5.75) 36(2.25,5.75) 37(1.75,5.75) 38(1.25,5.75) 39(0.75,5.75) 40(0.25,5.75) 41(-0.25,5.75) 42(-0.75,5.75) 43(-1.25,5.75) 44(-1.75,5.75) 45(-2.25,5.75) 46(-2.75,5.75) 47(-3.25,5.75) 48(-3.75,5.75)
  oval 2x0.3 smd: 17(5.75,-3.75) 18(5.75,-3.25) 19(5.75,-2.75) 20(5.75,-2.25) 21(5.75,-1.75) 22(5.75,-1.25) 23(5.75,-0.75) 24(5.75,-0.25) 25(5.75,0.25) 26(5.75,0.75) 27(5.75,1.25) 28(5.75,1.75) 29(5.75,2.25) 30(5.75,2.75) 31(5.75,3.25) 32(5.75,3.75) 49(-5.75,3.75) 50(-5.75,3.25) 51(-5.75,2.75) 52(-5.75,2.25) 53(-5.75,1.75) 54(-5.75,1.25) 55(-5.75,0.75) 56(-5.75,0.25) 57(-5.75,-0.25) 58(-5.75,-0.75) 59(-5.75,-1.25) 60(-5.75,-1.75) 61(-5.75,-2.25) 62(-5.75,-2.75) 63(-5.75,-3.25) 64(-5.75,-3.75)
  silkscreen extent -5,-5.79 5,5
QFN-64_L9.0-W9.0-P0.50-BL-EP6.0 [mm]
  oval 0.26x0.9 smd paste-100 mask+0.051: 1(-3.75,-4.55) 2(-3.25,-4.55) 3(-2.75,-4.55) 4(-2.25,-4.55) 5(-1.75,-4.55) 6(-1.25,-4.55) 7(-0.75,-4.55) 8(-0.25,-4.55) 9(0.25,-4.55) 10(0.75,-4.55) 11(1.25,-4.55) 12(1.75,-4.55) 13(2.25,-4.55) 14(2.75,-4.55) 15(3.25,-4.55) 16(3.75,-4.55) 33(3.75,4.55) 34(3.25,4.55) 35(2.75,4.55) 36(2.25,4.55) 37(1.75,4.55) 38(1.25,4.55) 39(0.75,4.55) 40(0.25,4.55) 41(-0.25,4.55) 42(-0.75,4.55) 43(-1.25,4.55) 44(-1.75,4.55) 45(-2.25,4.55) 46(-2.75,4.55) 47(-3.25,4.55) 48(-3.75,4.55)
  oval 0.9x0.26 smd paste-100 mask+0.051: 17(4.55,-3.75) 18(4.55,-3.25) 19(4.55,-2.75) 20(4.55,-2.25) 21(4.55,-1.75) 22(4.55,-1.25) 23(4.55,-0.75) 24(4.55,-0.25) 25(4.55,0.25) 26(4.55,0.75) 27(4.55,1.25) 28(4.55,1.75) 29(4.55,2.25) 30(4.55,2.75) 31(4.55,3.25) 32(4.55,3.75) 49(-4.55,3.75) 50(-4.55,3.25) 51(-4.55,2.75) 52(-4.55,2.25) 53(-4.55,1.75) 54(-4.55,1.25) 55(-4.55,0.75) 56(-4.55,0.25) 57(-4.55,-0.25) 58(-4.55,-0.75) 59(-4.55,-1.25) 60(-4.55,-1.75) 61(-4.55,-2.25) 62(-4.55,-2.75) 63(-4.55,-3.25) 64(-4.55,-3.75)
  rect 6x6 smd paste-100 mask+0.051: 65(0,0)
  silkscreen extent -4.5,-5.07 4.5,4.5
R0402 [mm]
  rect 0.6x0.5 smd: 1(-0.5,0) 2(0.5,0)
  silkscreen extent -0.9,-0.35 0.9,0.35, body extent -0.5,-0.25 0.5,0.25, height 0.35
R0603 [mil]
  rect 30x30 smd: 1(-27.5,0) 2(27.5,0)
  silkscreen extent -48,-21 48,21, body extent -31,-16 31,16, height 18
SOD-123FL_L2.7-W1.8-LS3.8-BI [mm]
  rect 1.4x1.2 smd: 1(-1.735,0) 2(1.735,0)
  silkscreen extent -1.38,-0.93 1.38,0.93
SOIC-8_L4.9-W3.9-P1.27-LS6.0-BL [mm]
  oval 0.588x2.045 smd: 1(-1.905,-2.772) 2(-0.635,-2.772) 3(0.635,-2.772) 4(1.905,-2.772) 5(1.905,2.772) 6(0.635,2.772) 7(-0.635,2.772) 8(-1.905,2.772)
  silkscreen extent -2.8,-2.92 2.53,1.52
SOT-23-3_L2.9-W1.3-P1.90-LS2.4-BR [mm]
  rect 1.25x0.7 smd: 1(1,-0.95) 2(1,0.95) 3(-1,0)
  silkscreen extent -0.73,-1.53 0.73,1.53
SW-SMD_L3.9-W3.0-P4.45 [mm]
  rect 1.23x1.36 smd: 1(-2.185,0) 2(2.185,0)
  silkscreen extent -2.03,-1.62 2.25,1.62
TEST_1.2 [mm]
  round 1.4 smd paste-1.4: 1(0,0)
  silkscreen extent -0.89,-0.89 0.89,0.89
XFMR-SMD_24P-L15.6-W8.5-P1.27-LS9.5-BL [mm]
  rect 0.8x1.55 smd: 1(-6.985,-4.475) 2(-5.715,-4.475) 3(-4.445,-4.475) 4(-3.175,-4.475) 5(-1.905,-4.475) 6(-0.635,-4.475) 7(0.635,-4.475) 8(1.905,-4.475) 9(3.175,-4.475) 10(4.445,-4.475) 11(5.715,-4.475) 12(6.985,-4.475) 13(6.985,4.475) 14(5.715,4.475) 15(4.445,4.475) 16(3.175,4.475) 17(1.905,4.475) 18(0.635,4.475) 19(-0.635,4.475) 20(-1.905,4.475) 21(-3.175,4.475) 22(-4.445,4.475) 23(-5.715,4.475) 24(-6.985,4.475)
  silkscreen extent -8.41,-4.6 7.8,4.25

## Part data
C1 C2 C7 C10 C29 C30 C31 C32 C33 C34 C35 C36 C48 C49: library part CAP2057, "Capacitor", Manufacturer 1="AVX Corporation", Manufacturer Part Number 1=04025A100JAT2A, Operating Temperature="-55C to +125C", Package=0402, Supplier Part Number 1=478-1070-1-ND, Temperature Coeffcient=100ppm/C, Tolerance=5%, Voltage=50V, Category=Capacitor, ComponentLink1Description="SVN Datasheet", ComponentLink1URL=https://chn-vm-apps.microchip.com/mchprepo/parts/Datasheets/C0GNP0-Dielectric.pdf, ComponentLink2Description="Local Datasheet", ComponentLink2URL=C:\ALTIUM_WORK\00001_MCHP-CDB\Datasheets\C0GNP0-Dielectric.pdf, ComponentLink3Description="Open Symbol", ComponentLink3URL="C:\ALTIUM_WORK\00001_MCHP-CDB\Library\LibraryRefs\Capacitor NP.SchLib", ComponentLink4Description="Open Footprint", ComponentLink4URL=C:\ALTIUM_WORK\00001_MCHP-CDB\Library\Footprints\CAP_C_0402.PcbLib, ComponentLink5Description="Open Footprint 2", ComponentLink6Description="Open Footprint 3", ComponentLink7Description="Open Footprint 4", Description_="CAP CER 10pF 50V 5% NP0 SMD 0402", Dev Tools Status=Design, MCHP-ID=CAP2057, Owner="Ciprian Abramov", Populated=YES, Quantity Override=1, Revision=1, Status="MCL Design", Supplier 1=Digi-Key, Symbol="Capacitor NP", Type=Ceramic
C3 C4 C8 C9 C12 C13 C19 C24 C25 C26 C27 C28 C37 C38 C39 C40 C41 C42 C43 C44 C45 C46 C47 C50 C51 C52 C53 C54 C70: library part CAP, "电容"
C5 C6 C18 C20 C21: library part CAP0373, "Capacitor", Manufacturer 1=Murata, Manufacturer 2="Taiyo Yuden", Manufacturer Part Number 1=GRM21BR61C106KE15L, Manufacturer Part Number 2=EMK212BJ106KG-T, Operating Temperature="+25C to +125C", Package=0805, Supplier Part Number 1=490-3886-1-ND, Temperature Coeffcient=X5R, Tolerance=10%, Voltage=16V, Category=Capacitor, ComponentLink1Description=Datasheet, ComponentLink1URL=https://chn-vm-apps.microchip.com/mchprepo/parts/Datasheets/L0005E.pdf, Description_="CAP CER 10uF 16V 10% X5R SMD 0805", MCHP-ID=CAP0373, Populated=Yes, Quantity Override=1, Revision=1, Status=Production, Supplier 1=Digi-Key, Supplier 2=Digi-Key, Supplier 3=Newark, Supplier Part Number 2=587-1295-1-ND, Supplier Part Number 3=30K5459, Type=Ceramic
C11 C14 C15 C16 C17: library part CAP1033, "Capacitor", Manufacturer 1=Murata, Manufacturer Part Number 1=GRM155R71C104KA88D, Operating Temperature="-55C to +125C", Package=0402, Supplier Part Number 1=490-3261-2-ND, Temperature Coeffcient=X7R, Tolerance=10%, Voltage=16V, Category=Capacitor, ComponentLink1Description=Datasheet, ComponentLink1URL=https://chn-vm-apps.microchip.com/mchprepo/parts/Datasheets/L0005E.pdf, Description_="CAP CER 0.1uF 16V 10% X7R SMD 0402", MCHP-ID=CAP1033, Owner="Sompoch Loboonlert", Populated=Yes, Quantity Override=1, Revision=2, Status=Production, Supplier 1=Digi-Key, Type=Ceramic
CN1 CN2: JLCPCB Part Class="Extended Part", LCSC Part Name="系列:GH 间距:1.25mm 1x5P", Manufacturer=CJT(长江连接器), Add into BOM=yes, Contact Material=黄铜, Convert to PCB=yes, Datasheet=https://atta.szlcsc.com/upload/public/pdf/source/20181008/C272994_C9E89FA8A36D0009CAD30AD8C59C2782.pdf, Device=A1257WR-S-5P, Manufacturer Part=A1257WR-S-5P, Mounting Style=-, Number of Pins=5P, Number of PINs Per Row=5, Number of Rows=1, Pins Structure=1x5P, Pitch=1.25mm, Reference Series=GH, Row Spacing=-, Supplier=LCSC, Supplier Footprint=SMD,P=1.25mm,卧贴, Supplier Part=C225128, Symbol=A1257WR-S-5P
D1 D3 D6 D8: Color Temperature=-, Emitted Color=翠绿色, Forward Current=5mA, Forward Voltage (VF)=2.6V~3V, JLCPCB Part Class="Extended Part", Lens Color=绿色透镜, Manufacturer=XINGLIGHT(成兴光), Power Dissipation=75mW, Add into BOM=yes, Convert to PCB=yes, Datasheet=https://atta.szlcsc.com/upload/public/pdf/source/20240218/2F8A7AF596DEEB38157DAB7856E382C0.pdf, Device=XL-1608PGC-06, Diode Configuration=-, Dominant Wavelength=505nm~540nm, Lamp Holder Type=-, LCSC Part Name=XL-1608PGC-06, Luminous Intensity=299mcd, Manufacturer Part=XL-1608PGC-06, Mounting Sytle=正贴, Operating Temperature=-, Peak Wavelength=530nm, Supplier=LCSC, Supplier Footprint=0603, Supplier Part=C7371905, Symbol=XL-1608PGC-06, Viewing Angle=130°
D2: library part SMF6.5CA_C19077501, Breakdown Voltage=7.22V, JLCPCB Part Class="Extended Part", Manufacturer=宏迦橙, Maximum Clamping Voltage=11.2V, Operating Temperature=-55℃~+155℃, Peak Pulse Current (Ipp)=17.9A, Peak Pulse Power Dissipation (Ppp)=200W, Reverse Leakage Current (Ir)=1uA, Reverse Stand-Off Voltage (Vrwm)=6.5V, Add into BOM=yes, Convert to PCB=yes, Datasheet=https://atta.szlcsc.com/upload/public/pdf/source/20241029/BBF9A11676F655A5C9D4546A153AB943.pdf, Device=SMF6.5CA_C19077501, LCSC Part Name=SMF6.5CA, Manufacturer Part=SMF6.5CA, Number of Lines=单路, polarity=双向, Supplier=LCSC, Supplier Footprint=SOD-123FL, Supplier Part=C19077501, Symbol=SMF6.5CA_C19077501, Type=TVS
D4 D5 D7: Color Temperature=-, Forward Current=20mA, Illumination Color=红色, JLCPCB Part Class="Extended Part", Lens Color=无色透明透镜, Manufacturer=XINGLIGHT(成兴光), Operating Temperature=-20℃~+85℃, Power(Watts)=50mW, Voltage - Forward(Vf)=2.3V, Add into BOM=yes, Convert to PCB=yes, Datasheet=https://atta.szlcsc.com/upload/public/pdf/source/20250213/F9766CE804AF391355DCDD48DB3E0DAB.pdf, Device=XL-1608SURC-06, Diode Configuration=-, Lamp Holder Type=-, LCSC Part Name=XL-1608SURC-06, Luminous Intensity=225mcd, Manufacturer Part=XL-1608SURC-06, Mounting Sytle=正贴, Peak Wavelength=625nm, Supplier=LCSC, Supplier Footprint=0603, Supplier Part=C965799, Symbol=XL-1608SURC-06, Viewing Angle=120°, Wavelength - Dominant=620nm~630nm
D11: library part SMF6.5CA_C19077501, Breakdown Voltage=7.22V, JLCPCB Part Class="Extended Part", LCSC Part Name=SMF6.5CA, Manufacturer=宏迦橙, Maximum Clamping Voltage=11.2V, Operating Temperature=-55℃~+155℃, Peak Pulse Current (Ipp)=17.9A, Peak Pulse Power Dissipation (Ppp)=200W, Reverse Leakage Current (Ir)=1uA, Reverse Stand-Off Voltage (Vrwm)=6.5V, Add into BOM=yes, Convert to PCB=yes, Datasheet=https://atta.szlcsc.com/upload/public/pdf/source/20241029/BBF9A11676F655A5C9D4546A153AB943.pdf, Device=SMF6.5CA_C19077501, Manufacturer Part=SMF6.5CA, Number of Lines=单路, polarity=双向, Supplier=LCSC, Supplier Footprint=SOD-123FL, Supplier Part=C19077501, Symbol=SMF6.5CA_C19077501, Type=TVS
L1 L4 L5 L6 L7: Current Rating=200mA, DC Resistance=450mΩ, Impedance @ Frequency=600Ω@100MHz, JLCPCB Part Class="Basic Part", LCSC Part Name="单路 0603磁珠 阻抗600Ω@100MHz", Manufacturer=Sunlord(顺络), Tolerance=±25%, Add into BOM=yes, Circuits=1, Convert to PCB=yes, Datasheet=https://atta.szlcsc.com/upload/public/pdf/source/20241120/893429B990C3BA07384E734821D2F218.pdf, Device=GZ1608D601TF, Manufacturer Part=GZ1608D601TF, Supplier=LCSC, Supplier Footprint=0603, Supplier Part=C1002, Symbol=GZ1608D601TF
R1 R9: library part RES, "电阻"
R2 R3 R4 R7 R14 R15 R16 R17 R23 R24 R26 R28 R30 R31 R32 R33 R34 R35 R36 R37 R38 R39 R40 R41 R42 R43 R44 R45 R46 R47 R48 R49 R53 R54 R55 R58 R59 R61 R72 R73: library part RSMT0625, "Resistor", Manufacturer 1=Vishay, Manufacturer 2=ROHM, Manufacturer Part Number 1=CRCW060310K0FKEA, Manufacturer Part Number 2=MCR03EZPFX1002, Operating Temperature="-55C to +155C", Package=0603, Power=1/10W, Supplier Part Number 1=541-10.0KHCT-ND, Temperature Coeffcient=100ppm/C, Tolerance=1%, Voltage=75V, Category=Resistor, ComponentLink1Description=Datasheet, ComponentLink1URL=https://chn-vm-apps.microchip.com/mchprepo/parts/Datasheets/dcrcwe3.pdf, Composition=TKF, Description_="RES TKF 10k 1% 1/10W SMD 0603", MCHP-ID=RSMT0625, Populated=Yes, Quantity Override=1, Revision=1, Status=Production, Supplier 1=Digi-Key, Supplier 2=Digi-Key, Supplier Part Number 2=RHM10.0KHCT-ND, Type="RES SMD"
R19 R20 R25 R56 R57 R60 R70 R71 R74 R75 R76 R77 R78 R79 R80 R90 R91 R92: library part RSMT0001, "Resistor", Manufacturer 1=Panasonic, Manufacturer 2="NIC Components", Manufacturer 4="Stackpole Electronics Inc", Manufacturer 5=Vishay, Manufacturer 7=Yageo, Manufacturer 8="KOA Speer", Manufacturer 9=ROHM, Manufacturer Part Number 1=ERJ-3GSY0R00V, Manufacturer Part Number 2=NRC06Z0TRF, Manufacturer Part Number 3=ERJ-3GEY0R00V, Manufacturer Part Number 4=RMCF0603ZT0R00, Manufacturer Part Number 5=CRCW06030000Z0EA, Manufacturer Part Number 6="RMCF 1/16 0 R", Manufacturer Part Number 7=RC0603JR-070RL, Manufacturer Part Number 8=RK73Z1JTTP, Manufacturer Part Number 9=MCR03EZPJ000, Operating Temperature="-55C to +155C", Package=0603, Power=1/10W, Category=Resistor, ComponentLink1Description=Datasheet, ComponentLink1URL=https://chn-vm-apps.microchip.com/mchprepo/parts/Datasheets/nrc.pdf, Composition=TKF, Description_="RES TKF 0R 1/10W SMD 0603", Manufacturer 3=Panasonic, Manufacturer 6="Stackpole Electronics Inc", MCHP-ID=RSMT0001, Populated=Yes, Quantity Override=1, Revision=2, Status=Production, Supplier 1=Digi-Key, Supplier 2="NIC Components", Supplier 3=Digi-Key, Supplier 4=Digi-Key, Supplier 5=Digi-Key, Supplier 6=Digi-Key, Supplier 7=Digi-Key, Supplier 8="KOA Speer", Supplier 9=Digi-Key, Supplier Part Number 1=NRC06Z0TRF, Supplier Part Number 2=P0.0GTR-ND, Supplier Part Number 3=RMCF0603ZT0R00TR-ND, Supplier Part Number 4=RMCF0603ZT0R00CT-ND, Supplier Part Number 5=541-0.0GCT-ND, Supplier Part Number 6=RMCF1/160RTR-ND, Supplier Part Number 7=311-0.0GRCT-ND, Supplier Part Number 8=RK73Z1JTTP, Supplier Part Number 9=RHM0.0GCT-ND, Type="RES SMD"
R21 R22 R29 R50 R51 R52: library part RES1130, "Resistor", Manufacturer 1=Panasonic, Manufacturer Part Number 1=ERJ-3EKF2201V, Operating Temperature="-55C to +155C", Package=0603, Power=1/10W, Supplier Part Number 1=P2.20KHCT-ND, Temperature Coeffcient=100ppm/C, Tolerance=1%, Voltage=75V, Category=Resistor, ComponentLink1Description=Datasheet, ComponentLink1URL=https://chn-vm-apps.microchip.com/mchprepo/parts/Datasheets/AOA0000CE2.pdf, Composition=TKF, Description_="RES TKF 2.2k 1% 1/10W SMD 0603", MCHP-ID=RES1130, Owner="Bogdan P (M91398)", Populated=Yes, Quantity Override=1, Revision=0, Status=Production, Supplier 1=Digi-Key, Type="RES SMD"
SW1 SW2 SW3 SW4: Contact Current=50mA, JLCPCB Part Class="Extended Part", LCSC Part Name="3.9*2.93*2mm 立贴 轻触开关", Manufacturer=XUNPU(讯普), Voltage Rating (DC)=12V, Actuator Style=圆形按钮, Add into BOM=yes, Circuit=单刀单掷, Convert to PCB=yes, Datasheet=https://atta.szlcsc.com/upload/public/pdf/source/20191118/C455281_EC5379764BC1462550DF64BBBFEA9579.pdf, Device=TS-1088R-02026, Manufacturer Part=TS-1088R-02026, Mechanical Life=-, Mounting Style=立贴, Supplier=LCSC, Supplier Footprint=SMD,3x4mm, Supplier Part=C455280, Switch Height=2mm, Switch Length=3.9mm, Switch Width=2.93mm, Symbol=TS-1088R-02026, With Lamp=-
TP1 TP2 TP4 TP5 TP6 TP7 TP8 TP9 TP10 TP11 TP12 TP13: library part MISC0028, Manufacturer 1=Keystone, Manufacturer 2="FuZhou XiXiang", Manufacturer Part Number 1=5002, Manufacturer Part Number 2=CONN00189B01, Supplier Part Number 1=36-5002-ND, Category=Connector, ComponentLink1Description="SVN Datasheet", ComponentLink1URL=https://chn-vm-apps.microchip.com/mchprepo/parts/Datasheets/5000-5004.PDF, ComponentLink2Description="Local Datasheet", ComponentLink2URL=C:\ALTIUM_WORK\00001_MCHP-CDB\Datasheets\5000-5004.PDF, ComponentLink3Description="Open Symbol", ComponentLink3URL="C:\ALTIUM_WORK\00001_MCHP-CDB\Library\LibraryRefs\Test Point.SchLib", ComponentLink4Description="Open Footprint", ComponentLink4URL=C:\ALTIUM_WORK\00001_MCHP-CDB\Library\Footprints\CON_TP_TH_V_WHT_KEC_5002.PcbLib, ComponentLink5Description="Open Footprint 2", ComponentLink6Description="Open Footprint 3", ComponentLink7Description="Open Footprint 4", Description_="MISC, TEST POINT MULTI PURPOSE MINI WHITE", Dev Tools Status=Production, MCHP-ID=MISC0028, Quantity Override=1, Revision=0, Status="MCL Design", Supplier 1=Digi-Key, Supplier 2=Raynen, Supplier Part Number 2=CONN00189B01, Symbol="Test Point", Type="Test Point"
  TP1 TP2 TP4 TP5 TP6 TP7 TP8 TP9 TP10 TP11: Populated=NC
  TP12: Populated=DNP
  TP13: Populated=Yes
TP3 TP14: library part MISC0027, Manufacturer 1=Keystone, Manufacturer Part Number 1=5000, Supplier Part Number 1=36-5000-ND, Category=Connector, ComponentLink1Description="SVN Datasheet", ComponentLink1URL=https://chn-vm-apps.microchip.com/mchprepo/parts/Datasheets/5000-5004.PDF, ComponentLink2Description="Local Datasheet", ComponentLink2URL=C:\ALTIUM_WORK\00001_MCHP-CDB\Datasheets\5000-5004.PDF, ComponentLink3Description="Open Symbol", ComponentLink3URL="C:\ALTIUM_WORK\00001_MCHP-CDB\Library\LibraryRefs\Test Point.SchLib", ComponentLink4Description="Open Footprint", ComponentLink4URL=C:\ALTIUM_WORK\00001_MCHP-CDB\Library\Footprints\CON_TP_TH_V_RED_KEC_5000.PcbLib, ComponentLink5Description="Open Footprint 2", ComponentLink6Description="Open Footprint 3", ComponentLink7Description="Open Footprint 4", Description_="MISC, TEST POINT MULTI PURPOSE MINI RED", Dev Tools Status=Production, MCHP-ID=MISC0027, Owner="Stephen Humberd", Populated=YES, Quantity Override=1, Revision=0, Status="MCL Design", Supplier 1=Digi-Key, Symbol="Test Point", Type="Test Point"
U1: JLCPCB Part Class="Extended Part", LCSC Part Name="MSL=3 带DSP和FPU的高性能基础系列ARM Cortex-M4 MCU，具有512 KB Flash、180 MHz CPU、ART加速器和双QSPI", Manufacturer=ST(意法半导体), Voltage - Supply=1.7V~3.6V, ADC (Bit)=12bit, Add into BOM=yes, Applications=-, Convert to PCB=yes, CPU Bit Width=32bit, CPU Core=ARM-M4, CPU Maximum Speed=180MHz, DAC (Bit)=12bit, Datasheet=https://atta.szlcsc.com/upload/public/pdf/source/20170518/1495086068896.pdf, Device=STM32F446RET6, Manufacturer Part=STM32F446RET6, Number of I/O=50, Program Memory Type=FLASH, Program Storage Size=512KB, Supplier=LCSC, Supplier Footprint=LQFP-64(10x10), Supplier Part=C69336, Symbol=STM32F446RET6
U2 U4: Current - Supply=70mA, JLCPCB Part Class="Extended Part", LCSC Part Name=高速CAN收发器，具有待机模式, Manufacturer=MICROCHIP(美国微芯), Operating Temperature=-40℃~+150℃, Voltage - Supply=4.5V~5.5V, Add into BOM=yes, Convert to PCB=yes, Data Rate=5Mbps, Datasheet=https://atta.szlcsc.com/upload/public/pdf/source/20211008/C2671262_D7FCCB811013C7D69A57B5A2D230BAD0.pdf, Device=ATA6561-GAQW, Manufacturer Part=ATA6561-GAQW, Supplier=LCSC, Supplier Footprint=SOIC-8, Supplier Part=C2929602, Symbol=ATA6561-GAQW, Type=CAN收发器
U3: JLCPCB Part Class="Extended Part", Manufacturer=MICROCHIP(美国微芯), Add into BOM=yes, Convert to PCB=yes, Datasheet=https://atta.szlcsc.com/upload/public/pdf/source/20221017/D7EA2E86F60CF265ECA55E2EC16558B7.pdf, Device=MCP1825-ADJE/ET, LCSC Part Name=MCP1825-ADJE/ET, Manufacturer Part=MCP1825-ADJE/ET, Supplier=LCSC, Supplier Footprint=TO-252-5, Supplier Part=C641133, Symbol=MCP1825-ADJE/ET
U5 U6 U7 U8 U9 U10 U12 U13 U14 U15 U17 U18 U21: Color=米色, Current Rating=1A, Flame Retardant Rating=-, JLCPCB Part Class="Extended Part", LCSC Part Name="1x4P 间距:1.25mm 卧贴 系列:GH", Manufacturer=XUNPU(讯普), Operating Temperature=-25℃~+85℃, Voltage Rating=125V, Add into BOM=yes, Contact Material=黄铜, Contact Plating=-, Convert to PCB=yes, Datasheet=https://atta.szlcsc.com/upload/public/pdf/source/20220527/CB8773BFB0913C3B8ABD62CB38BA101A.pdf, Device=WAFER-GH1.25-4PWB, Manufacturer Part=WAFER-GH1.25-4PWB, Mounting Type=卧贴, Number of Pins=4P, Number of PINs Per Row=4, Number of Rows=1, Pins Structure=1x4P, Pitch=1.25mm, Plastic Material=LCP, Reference Series=GH, Row Spacing=-, Supplementary Features=辅助焊脚, Supplier=LCSC, Supplier Footprint=SMD,P=1.25mm,卧贴, Supplier Part=C3029379, Symbol=WAFER-GH1.25-4PWB, X-Length of Bottom Edge on Board (Spacing Line)=8.25mm, Y-Width of Bottom Edge on Board=5mm, Z-Height of the Board=4.35mm
U11 U16: Breakdown Voltage=35.5V, JLCPCB Part Class="Extended Part", Manufacturer=TI(德州仪器), Maximum Clamping Voltage=37V, Reverse Stand-Off Voltage (Vrwm)=24V, Add into BOM=yes, Convert to PCB=yes, Datasheet=https://atta.szlcsc.com/upload/public/pdf/source/20230921/17CC51E991FF2C2961D299C09F950559.pdf, Device=ESD2CAN24DBZRQ1, LCSC Part Name=ESD2CAN24DBZRQ1, Manufacturer Part=ESD2CAN24DBZRQ1, Supplier=LCSC, Supplier Footprint=SOT-23-3, Supplier Part=C5736151, Symbol=ESD2CAN24DBZRQ1, Type=TVS
U19: library part MIC7449, Manufacturer 1="Microchip Technology", Manufacturer Part Number 1=LAN9252I/ML, Supplier Part Number 1=LAN9252I/ML-ND, Category=MCHP-Interface, ComponentLink1Description="SVN Datasheet", ComponentLink2Description="Local Datasheet", ComponentLink2URL=C:\ALTIUM_WORK\00001_MCHP-CDB\Datasheets\00001909A.pdf, ComponentLink3Description="Open Symbol", ComponentLink3URL="C:\ALTIUM_WORK\00001_MCHP-CDB\Library\LibraryRefs\LAN9252 QFN-64.SchLib", ComponentLink4Description="Open Footprint", ComponentLink4URL=C:\ALTIUM_WORK\00001_MCHP-CDB\Library\Footprints\QFN-64_9X9_EP6.PcbLib, ComponentLink5Description="Open Footprint 2", ComponentLink6Description="Open Footprint 3", ComponentLink7Description="Open Footprint 4", Description_="EtherCAT Slave Controller with dual integrated PHYs", Dev Tools Status=Production, MCHP-ID=MIC7449, Owner="Dragos Danaila", Populated=YES, Quantity Override=1, Revision=1, Status="MCL Design", Supplier 1=Digi-Key, Symbol="LAN9252 QFN-64", Type=Ethernet
U20: Inductor=350uH, JLCPCB Part Class="Extended Part", Manufacturer=CND-tek(磁联达), Operating Temperature=0℃~+70℃, Add into BOM=yes, Convert to PCB=yes, Datasheet=https://atta.szlcsc.com/upload/public/pdf/source/20241014/0B80D5D469EC1AC696135756317C671C.pdf, Device=G2426S, Function=-, HI-POT=1.5kV, LCSC Part Name=G2426S, Manufacturer Part=G2426S, port=单口, rate=1000M, Supplier=LCSC, Supplier Footprint=SMD-24P,16.5x9mm, Supplier Part=C5122140, Symbol=G2426S, Turns Ratio=1:1
U22: JLCPCB Part Class="Extended Part", Manufacturer=MICROCHIP(美国微芯), Operating Temperature=-40℃~+85℃, Supply Voltage=1.7V~5.5V, Add into BOM=yes, Convert to PCB=yes, Datasheet=https://atta.szlcsc.com/upload/public/pdf/source/20210322/C616767_73C40D6AF3E7F03B3009A73CDE6E5E94.pdf, Device=AT24C128C-SSHM-T, Interface Type=I2C, LCSC Part Name=AT24C128C-SSHM-T, Manufacturer Part=AT24C128C-SSHM-T, Memory Size=128Kbit, Supplier=LCSC, Supplier Footprint=SOIC-8, Supplier Part=C6478, Symbol=AT24C128C-SSHM-T
X1: Equivalent Series Resistance(ESR)=120Ω, Frequency Stability=±20ppm, JLCPCB Part Class="Extended Part", LCSC Part Name="YSX321SL 8MHZ 4P 3225 20PF ±10PPM -40~85℃ (±20PPM)", Load Capacitance=20pF, Manufacturer=YXC(扬兴晶振), Normal temperature Frequency Tolerance=±10ppm, Operating Temperature=-40℃~+85℃, Add into BOM=yes, Convert to PCB=yes, Datasheet=https://atta.szlcsc.com/upload/public/pdf/source/20240329/19D5F850207469550BEB00D7DFEDBC7A.pdf, Device=X32258MSB4SI, Manufacturer Part=X32258MSB4SI, Supplier=LCSC, Supplier Footprint=SMD3225-4P, Supplier Part=C2682774, Symbol=X32258MSB4SI, Type=贴片晶振
X2: Frequency Stability=±20ppm, JLCPCB Part Class="Extended Part", LCSC Part Name="YSX321SL 25MHZ 4P 3225 20PF ±10PPM -40~85℃ (±20PPM)", Load Capacitance=20pF, Manufacturer=YXC(扬兴晶振), Normal temperature Frequency Tolerance=±10ppm, Operating Temperature=-40℃~+85℃, Add into BOM=yes, Convert to PCB=yes, Datasheet=https://atta.szlcsc.com/upload/public/pdf/source/20240329/19D5F850207469550BEB00D7DFEDBC7A.pdf, Device=XL2EL89CSI-111YLC-25M, Manufacturer Part=XL2EL89CSI-111YLC-25M, Supplier=LCSC, Supplier Footprint=SMD3225-4P, Supplier Part=C5280577, Symbol=XL2EL89CSI-111YLC-25M, Type=贴片晶振
Y1: Frequency Stability=±30ppm, JLCPCB Part Class="Extended Part", LCSC Part Name="YST310S 32.768KHZ 2P 3215 12.5PF ±20PPM -40~85℃", Load Capacitance=12.5pF, Manufacturer=YXC(扬兴晶振), Normal temperature Frequency Tolerance=±20ppm, Operating Temperature=-40℃~+85℃, Add into BOM=yes, Convert to PCB=yes, Datasheet=https://atta.szlcsc.com/upload/public/pdf/source/20240329/3A7650FD985DD0DE85694D3785AB4916.pdf, Device=XKXGI-SUA-32.768K, Manufacturer Part=XKXGI-SUA-32.768K, Supplier=LCSC, Supplier Footprint=SMD3215-2P, Supplier Part=C5213671, Symbol=XKXGI-SUA-32.768K, Type=贴片晶振

## Free pads (board coordinates)
  round 157.48 hole 78.74: 0(1960.26,2412.23) 0(1960.26,3829.55) 0(3925.12,2412.23) 0(3925.12,3830.29)

## Via types
v1: diameter 18, hole 10, Top Layer to Bottom Layer, tented both sides, 389 vias

## Nets (pads, with @x,y where several pads share a name; then routed paths per layer and width w, separated by ;. In a path a pad name is that pad's centre, name@x,y a point inside that pad or via, vN(x,y) a via of type N, cw(c..) or ccw(c..) an arc to the next point about the centre after c; other vN are vias at no path point)
3V3: C4.2 C5.2 C9.2 C14.2 C15.2 C16.2 C17.2 C19.2 C20.2 C21.2 C39.2 C42.2 C43.2 C44.2 C45.2 C46.2 C47.2 D6.2 L4.1 L5.1 L6.1 R2.2 R4.1 R14.1 R15.1 R16.1 R17.1 R22.1 R23.1 R25.2 R26.1 R28.1 R29.1 R36.1 R39.1 R40.1 R49.1 R55.1 R58.2 R59.2 TP3.1 TP10.1 U1.1 U1.19 U1.32 U1.48 U1.64 U2.5 U3.4 U4.5 U19.5 U19.14 U19.20 U19.32 U19.37 U19.47 U21.1 U22.8 | length 2262.7
  Top Layer w8: v1(2786.73,2711.73) U19.14@2820.87,2711.73 ; v1(2786.73,2888.9) U19.5@2820.87,2888.9 ; v1(2905,2670) 2905,2667.29 2911,2661.29 2911,2641.29 U19.20@2911.43,2640.86 ; U19.32@3147.65,2640.86 v1(3174.14,2640.86) ; U19.37@3179.13,2751.1 3205.79,2751.1 v1(3215,2741.9) ; U19.47@3179.13,2947.95 v1(3217.95,2947.95) ; U1.1@3393.63,3267.64 3394.36,3268.37 3448.37,3268.37 v1(3450,3270) ; v1(3460,3410) 3472.36,3397.64 U1.64@3472.36,3346.37 ; U1.19@3511.73,2893.63 3511.73,2941.73 v1(3520,2950) ; U1.32@3767.64,2893.63 3767.64,2850.95 C14.2@3788.59,2830 ; U1.48@3846.37,3267.64 3878.95,3267.64 3888.31,3277 3888.31,3288.31 v1(3890,3290)
  Top Layer w18: v1(2210.14,3579.86) D6.2@2248.53,3579.86 ; R49.1@2519.68,3580 v1(2550,3580) ; v1(2630,2820) R40.1@2660.32,2820 ; v1(3700,3410) TP10.1@3700,3460 ; C9.2@3768.84,3615 v1(3805,3615) ; C14.2@3788.59,2830 3788.59,2795.25 C4.2@3788.84,2795 v1(3815,2795) ; v1(3890,3290) 3912.28,3290 3920,3282.28 C15.2@3920,3280.31
  Bottom Layer w18: U21.1@1902.01,3046.18 v1(1958.82,3046.18) ; R29.1@1967.5,2580 v1(1967.5,2617.5) ; v1(2150,2720) R36.1@2180.32,2720 ; v1(2755.69,2999.31) 2782.55,2972.45 L6.1@2795,2972.45 ; v1(2786.73,2711.73) 2820.87,2711.73 C46.2@2821.18,2711.42 ; v1(2786.73,2888.9) 2787.05,2888.59 C43.2@2821.18,2888.59 ; v1(2905,2670) 2934.14,2640.86 C45.2@2945,2640.86 ; C44.2@3147.65,2640.86 v1(3174.14,2640.86) ; R39.1@3159.13,2908.28 3178.82,2927.96 C39.2@3178.82,2947.64 3217.64,2947.64 v1(3217.95,2947.95) 3217.95,2997.16 L5.1@3215.11,3000 ; C42.2@3178.82,2750.79 3187.71,2741.9 v1(3215,2741.9) ; L4.1@3180,3060.64 3180,3035 v1(3185,3030) ; R4.1@3220.32,3520 3220.32,3507.18 C5.2@3260,3467.5 ; C16.2@3420,3258.19 3431.81,3270 v1(3450,3270) ; v1(3449.68,2640.32) R15.1@3449.68,2680 R14.1@3449.68,2720 R17.1@3449.68,2760 R16.1@3449.68,2800 ; v1(3460,3410) 3460,3380.32 C19.2@3460.31,3380 ; C17.2@3519.69,2920 3520,2920.31 v1(3520,2950) ; C21.2@3647.5,3360 v1(3647.5,3402.5) ; v1(3700,3410) 3712.5,3397.5 C20.2@3712.5,3360 ; C47.2@3705,2970.85 v1(3705,2995.81) U22.8@3705,3050.85 ; U2.5@3749.15,2795 v1(3815,2795) ; U4.5@3749.15,3615 v1(3805,3615) ; R22.1@3800,2527.5 v1(3837.5,2527.5) ; R58.2@3805,2931.48 R59.2@3855,2931.48 v1(3896.48,2931.48) ; v1(3890,2640) 3910,2620 R23.1@3920.32,2620 ; R25.2@3907.01,3106.6 3917.01,3096.6 v1(3917.01,3067.01) ; R26.1@3916.49,3220.63 v1(3944.37,3220.63) ; R28.1@3916.49,3347.56 v1(3916.49,3378.51) ; R55.1@3920,2720.32 v1(3949.68,2720.32)
  other v1: 3400,3440 3400,3480
5V: C3.2 C6.2 C8.2 C12.2 C13.2 D2.2 L1.2 R3.2 R21.1 TP2.1 U2.3 U3.2 U4.3 U5.1 U5.4 U6.1 U6.4 | length 847.2
  Top Layer w18: C8.2@3540,3579.69 3580.31,3579.69 v1(3595,3565) ; C3.2@3560,2739.69 3565.31,2745 v1(3585,2745) ; v1(3945.11,3455.11) U5.4@3997.08,3455.11 v1(4045.11,3455.11) ; v1(3950.32,2790.47) U6.1@3997.08,2790.47 v1(4049.53,2790.47) ; v1(3950.32,2938.11) U6.4@3997.08,2938.11 v1(4048.11,2938.11) ; U5.1@3997.08,3307.47 v1(4047.47,3307.47)
  Bottom Layer w18: U2.3@3530.85,2745 v1(3585,2745) ; U4.3@3530.85,3565 v1(3595,3565) ; R21.1@3790,3722.5 v1(3832.5,3722.5) ; L1.2@3880,3487.55 3892.45,3500 D2.2@3971.69,3500 ; C13.2@3920,2800.31 3932.82,2800.31 3942.66,2790.47 v1(3950.32,2790.47) ; v1(3945.11,3455.11) 3945.11,3473.42 D2.2@3971.69,3500 ; C12.2@3980.31,3560 3980.31,3508.62 D2.2@3971.69,3500
  other v1: 3340,3380 3380,3380
CAN0_H: R1.2 TP1.1 U2.7 U7.2 U7.3 U8.2 U8.3 U9.2 U9.3 U10.2 U10.3 U11.1 | length 3105.3
  Top Layer w10: v1(2272,2430) 2268.84,2433.16 2268.84,2482.71 2283.45,2497.31 U10.2@2283.45,2535.78 2283.45,2555.01 2268.84,2569.61 2268.84,2579.77 2275,2585.93 2341.3,2585.93 2347.27,2579.96 2347.27,2570.75 2332.66,2556.14 U10.3@2332.66,2535.78 2332.66,2514.16 2347.27,2499.55 2347.27,2479.79 2370.72,2456.33 2408.91,2456.33 2441.34,2488.77 2595.43,2488.77 2627.87,2456.33 2666.05,2456.33 2689.51,2479.79 2689.51,2499.55 2704.12,2514.16 U9.2@2704.12,2535.78 2704.12,2555.01 2689.51,2569.61 2689.51,2579.77 2695.67,2585.93 2761.97,2585.93 2767.94,2579.96 2767.94,2570.75 2753.33,2556.14 U9.3@2753.33,2535.78 2753.33,2514.16 2767.94,2499.55 2767.94,2479.79 2791.39,2456.33 2829.58,2456.33 2862.01,2488.77 3016.1,2488.77 3048.53,2456.33 3086.72,2456.33 3110.17,2479.79 3110.17,2499.55 3124.78,2514.16 U8.2@3124.78,2535.78 3124.78,2555.01 3110.18,2569.61 3110.18,2579.77 3116.34,2585.93 3182.64,2585.93 3188.6,2579.96 3188.6,2570.75 3173.99,2556.14 U8.3@3173.99,2535.78 3173.99,2514.16 3188.6,2499.55 3188.6,2479.79 3212.06,2456.33 3250.24,2456.33 3282.68,2488.77 3436.77,2488.77 3469.2,2456.33 3507.39,2456.33 3530.84,2479.79 3530.84,2499.55 3545.45,2514.16 U7.2@3545.45,2535.78 3545.45,2555.01 3530.85,2569.61 3530.85,2579.77 3537,2585.93 3603.3,2585.93 3609.27,2579.96 3609.27,2570.75 3594.66,2556.14 U7.3@3594.66,2535.78 3594.66,2514.16 3609.27,2499.55 3609.27,2479.79 3632.73,2456.33 3670.91,2456.33 3720,2505.42 3720,2607.42 3700,2627.42 3700,2695 3715,2710 3722.5,2710 R1.2@3740,2692.5 3757.5,2710 3804.41,2710 v1(3809.41,2705) 3835,2705 TP1.1@3860,2680
  Bottom Layer w10: v1(2272,2430) 2272,2444.4 2297.4,2469.8 U11.1@2297.4,2480.63 ; U2.7@3749.15,2695 3799.41,2695 v1(3809.41,2705)
CAN0_L: R1.1 TP4.1 U2.6 U7.1 U7.4 U8.1 U8.4 U9.1 U9.4 U10.1 U10.4 U11.2 | length 3137.5